# Altium PCB PCI Express Mini_3000X5095_52PIN_Full-Mini-Type F1.PCBDOC (part 1 of 8)
Units mm, origin at the board's own origin, x right, y up, seen from the top; angles counter-clockwise.
Board outline 70 x 83.2 mm, 6 copper layers (TopLayer, Layer 1, Layer 2, Layer 3, Layer 4, Bottom Layer), stack 0.914 mm thick; 380 components, 252 nets, 1258 pads, 603 vias.
Unrouted connection lines stored in the file: 10.
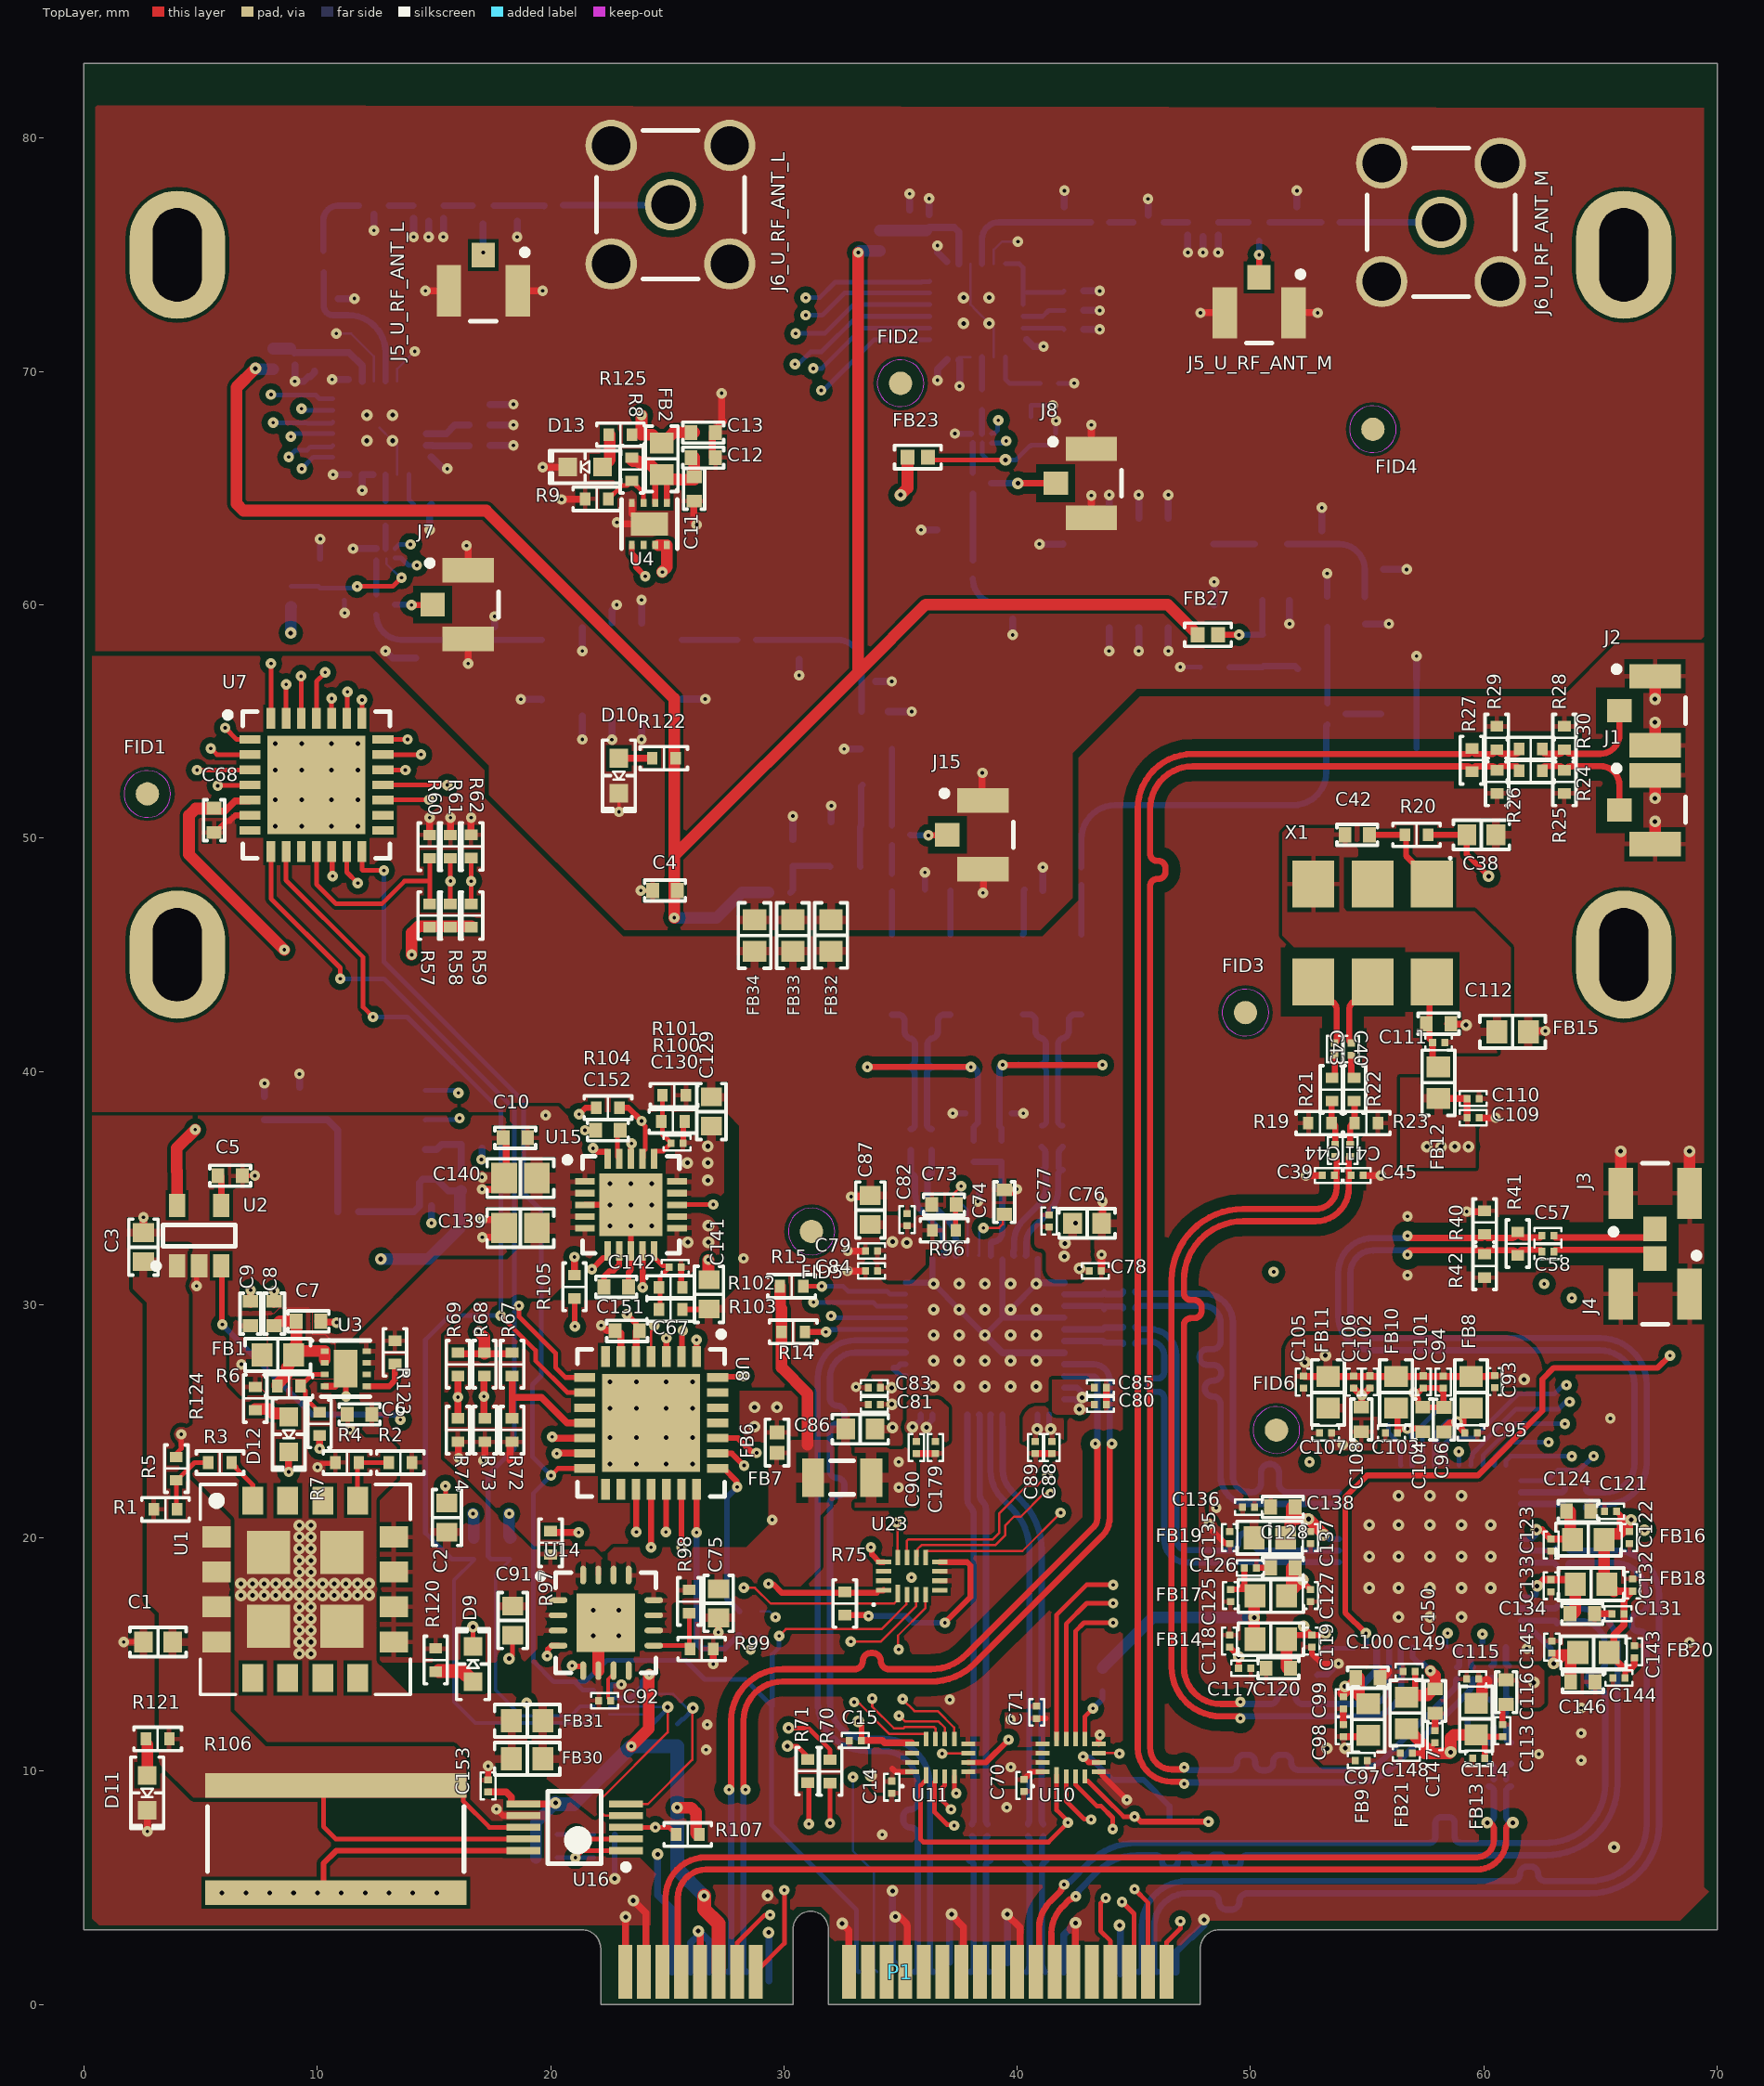
[diagram p0: TopLayer view]
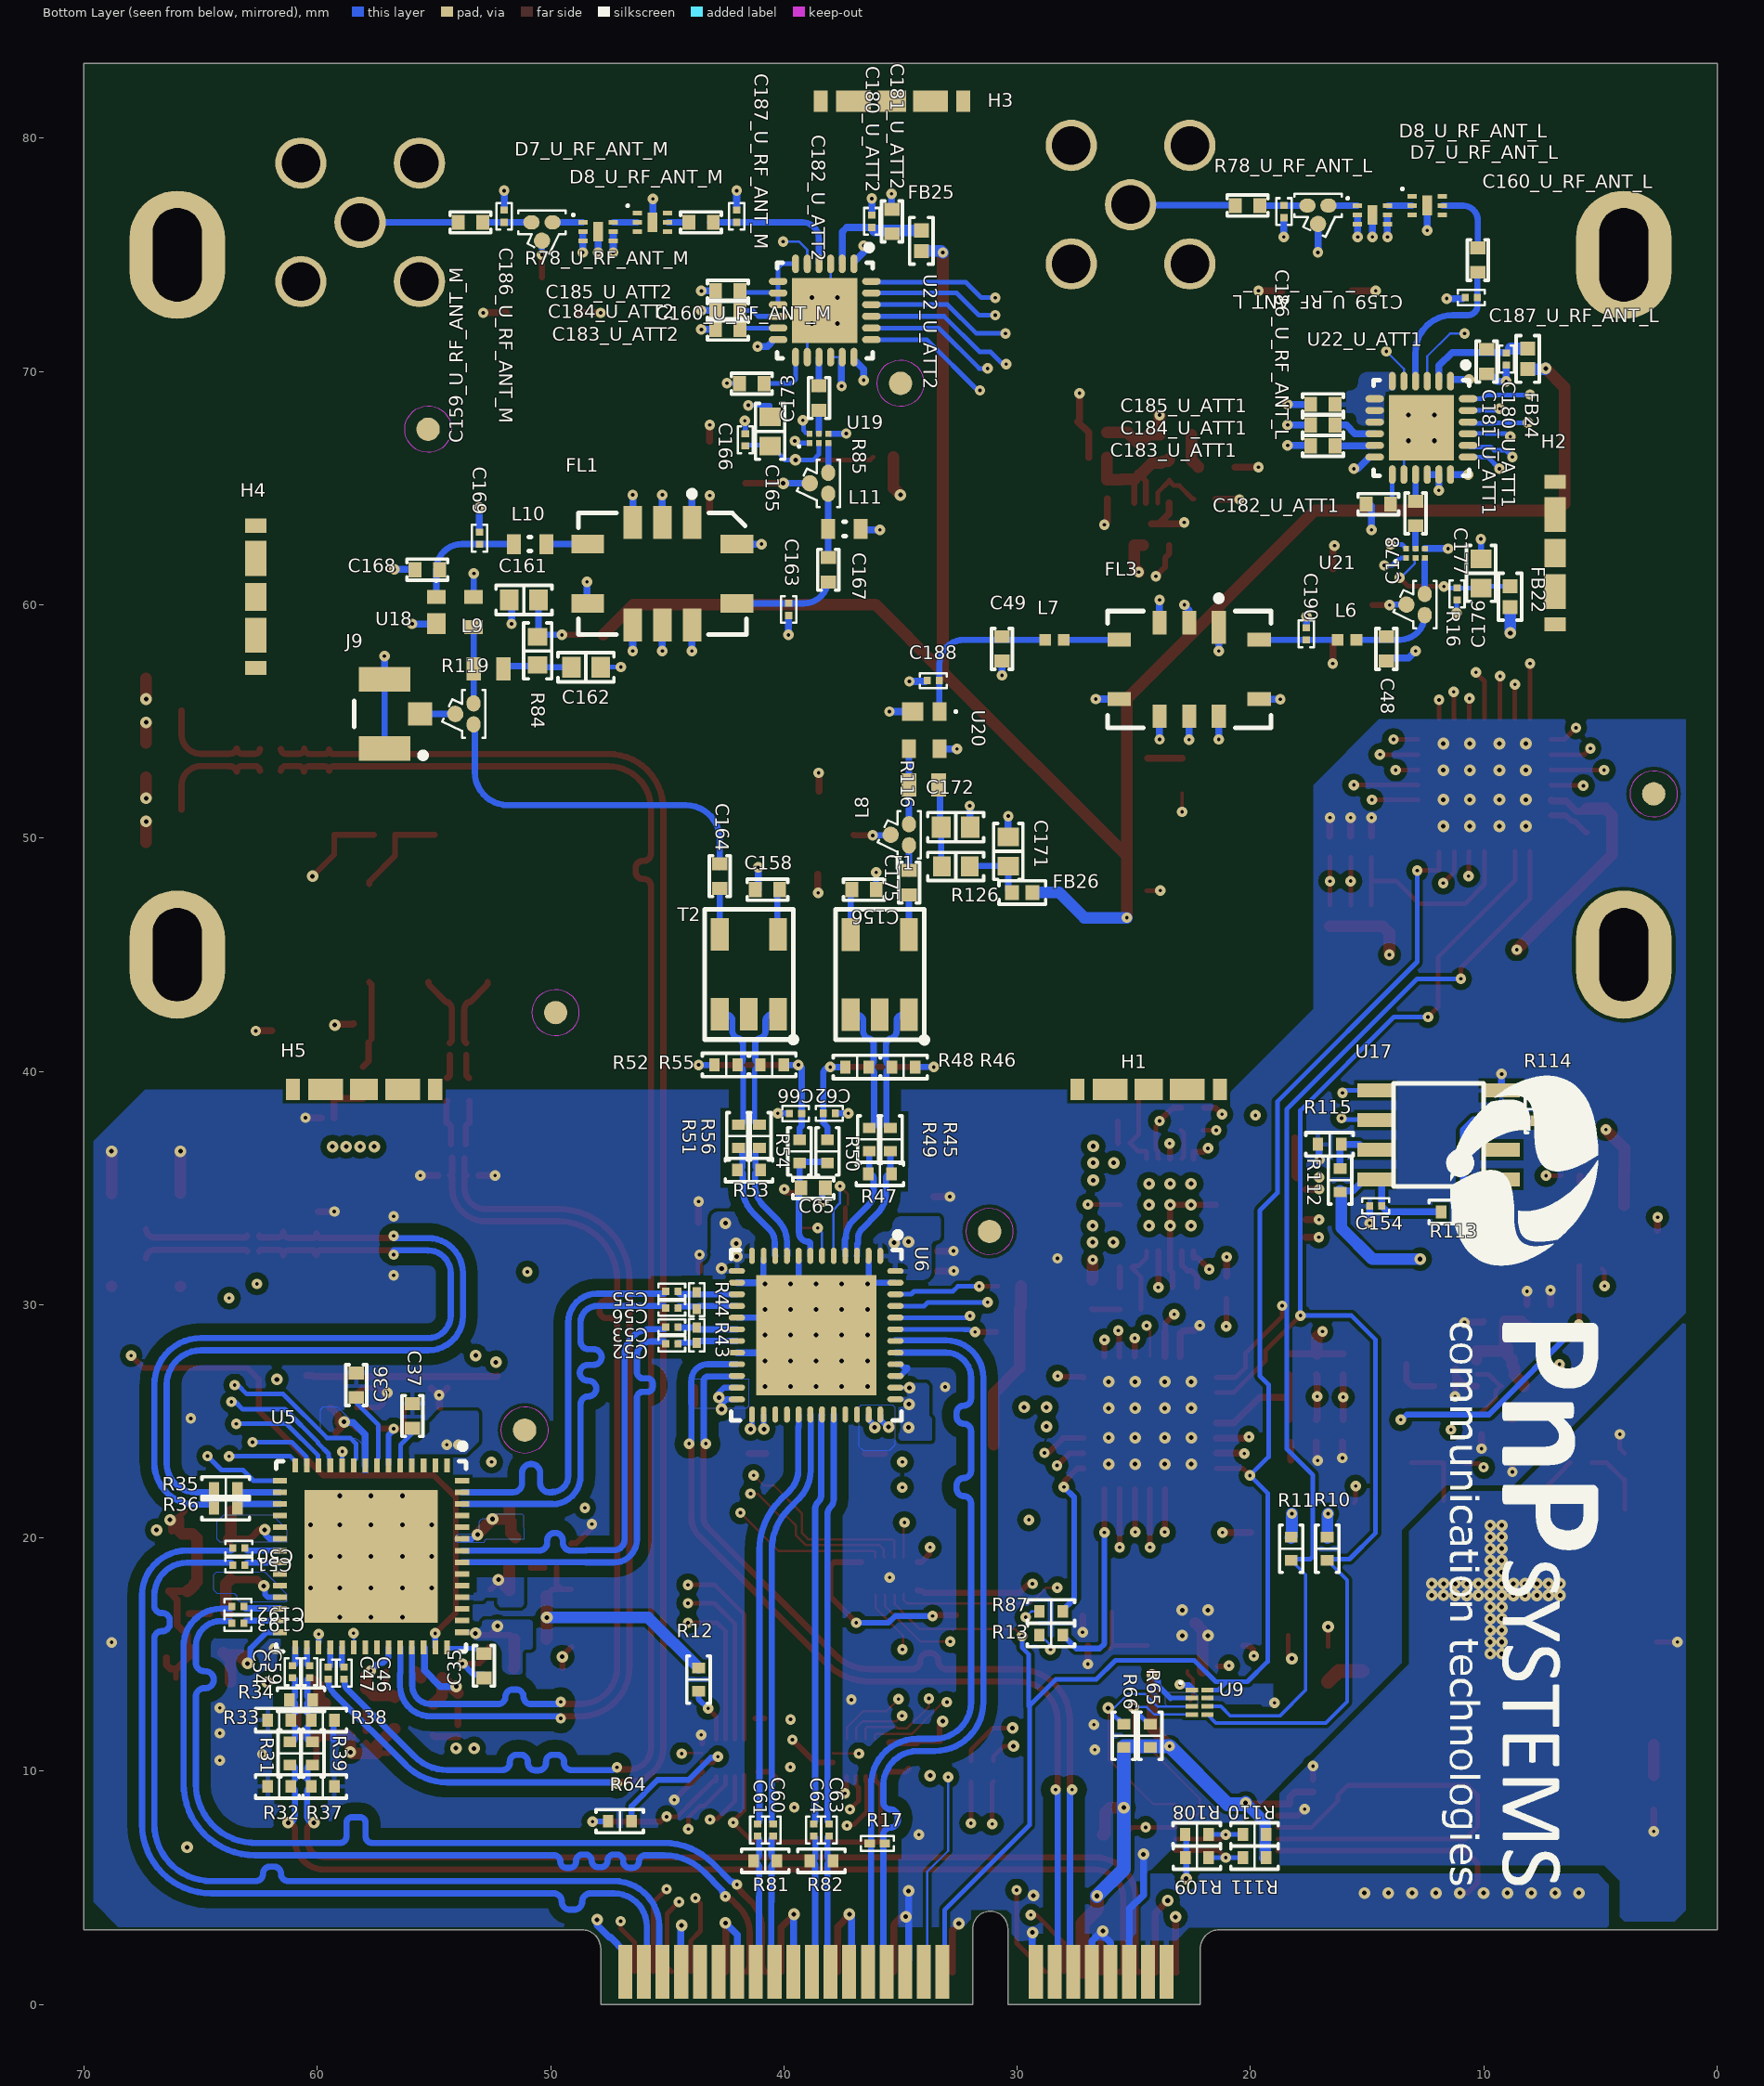
[diagram p1: Bottom Layer view, seen from below]
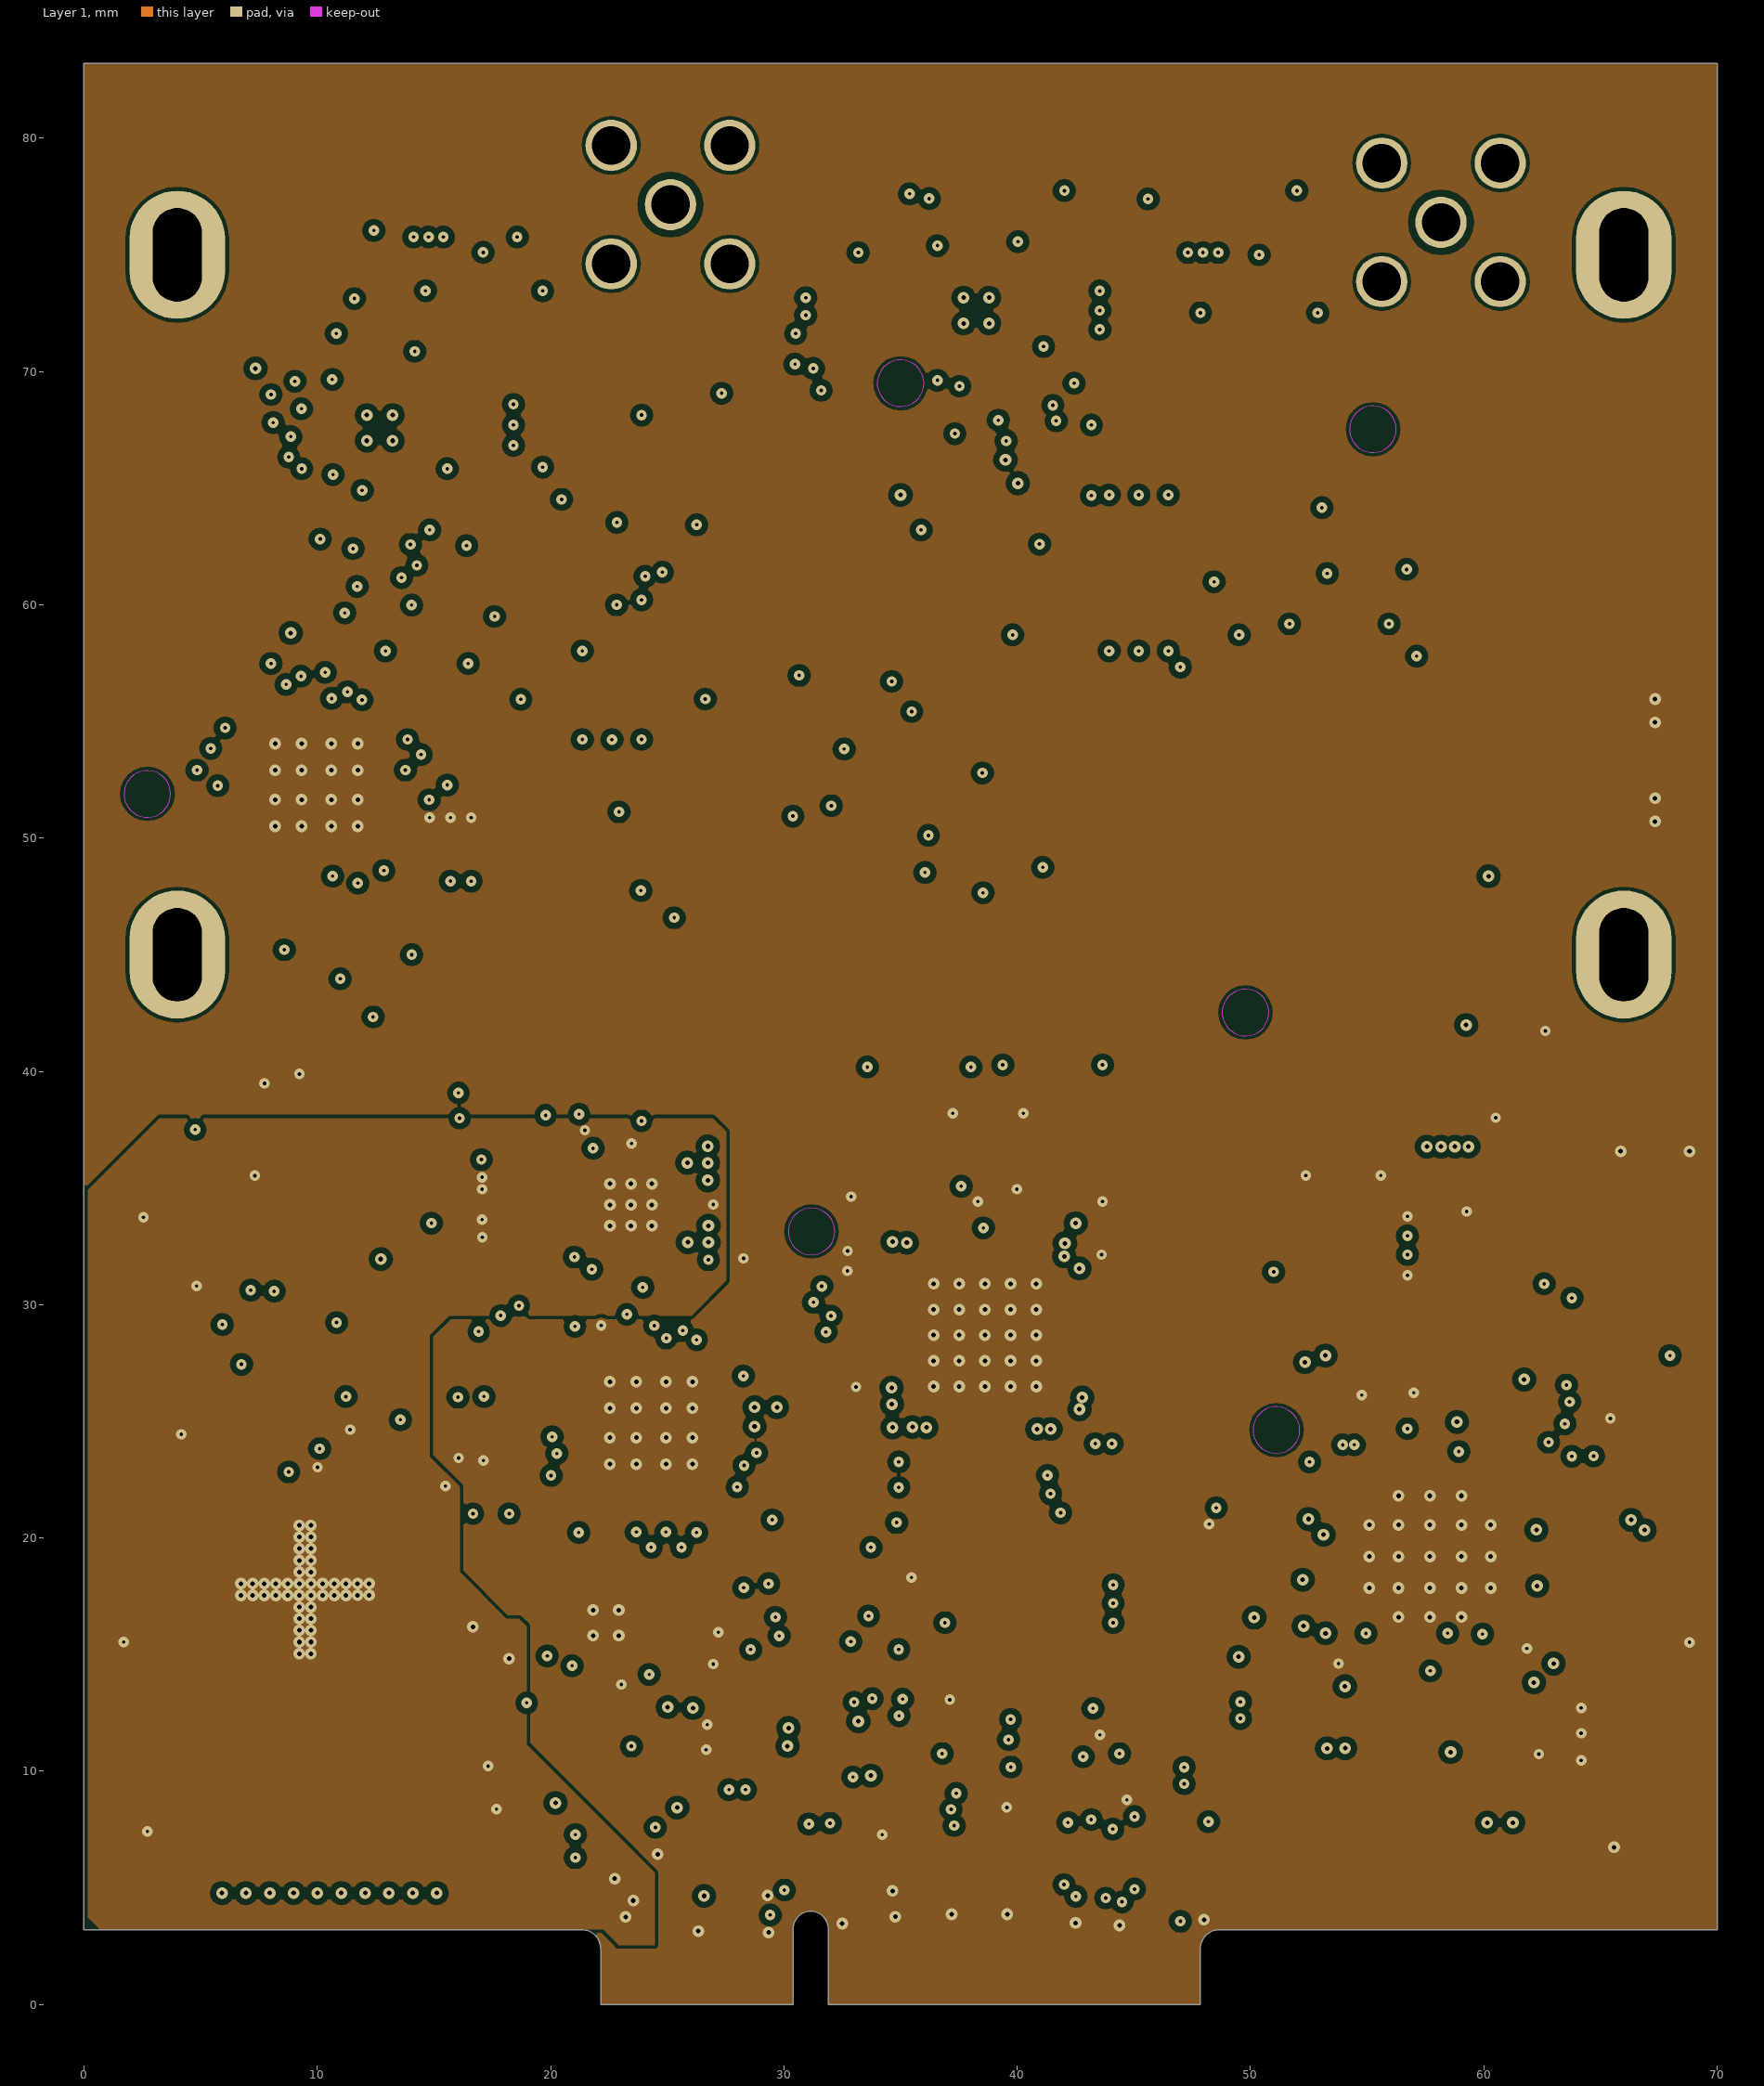
[diagram p2: Layer 1]
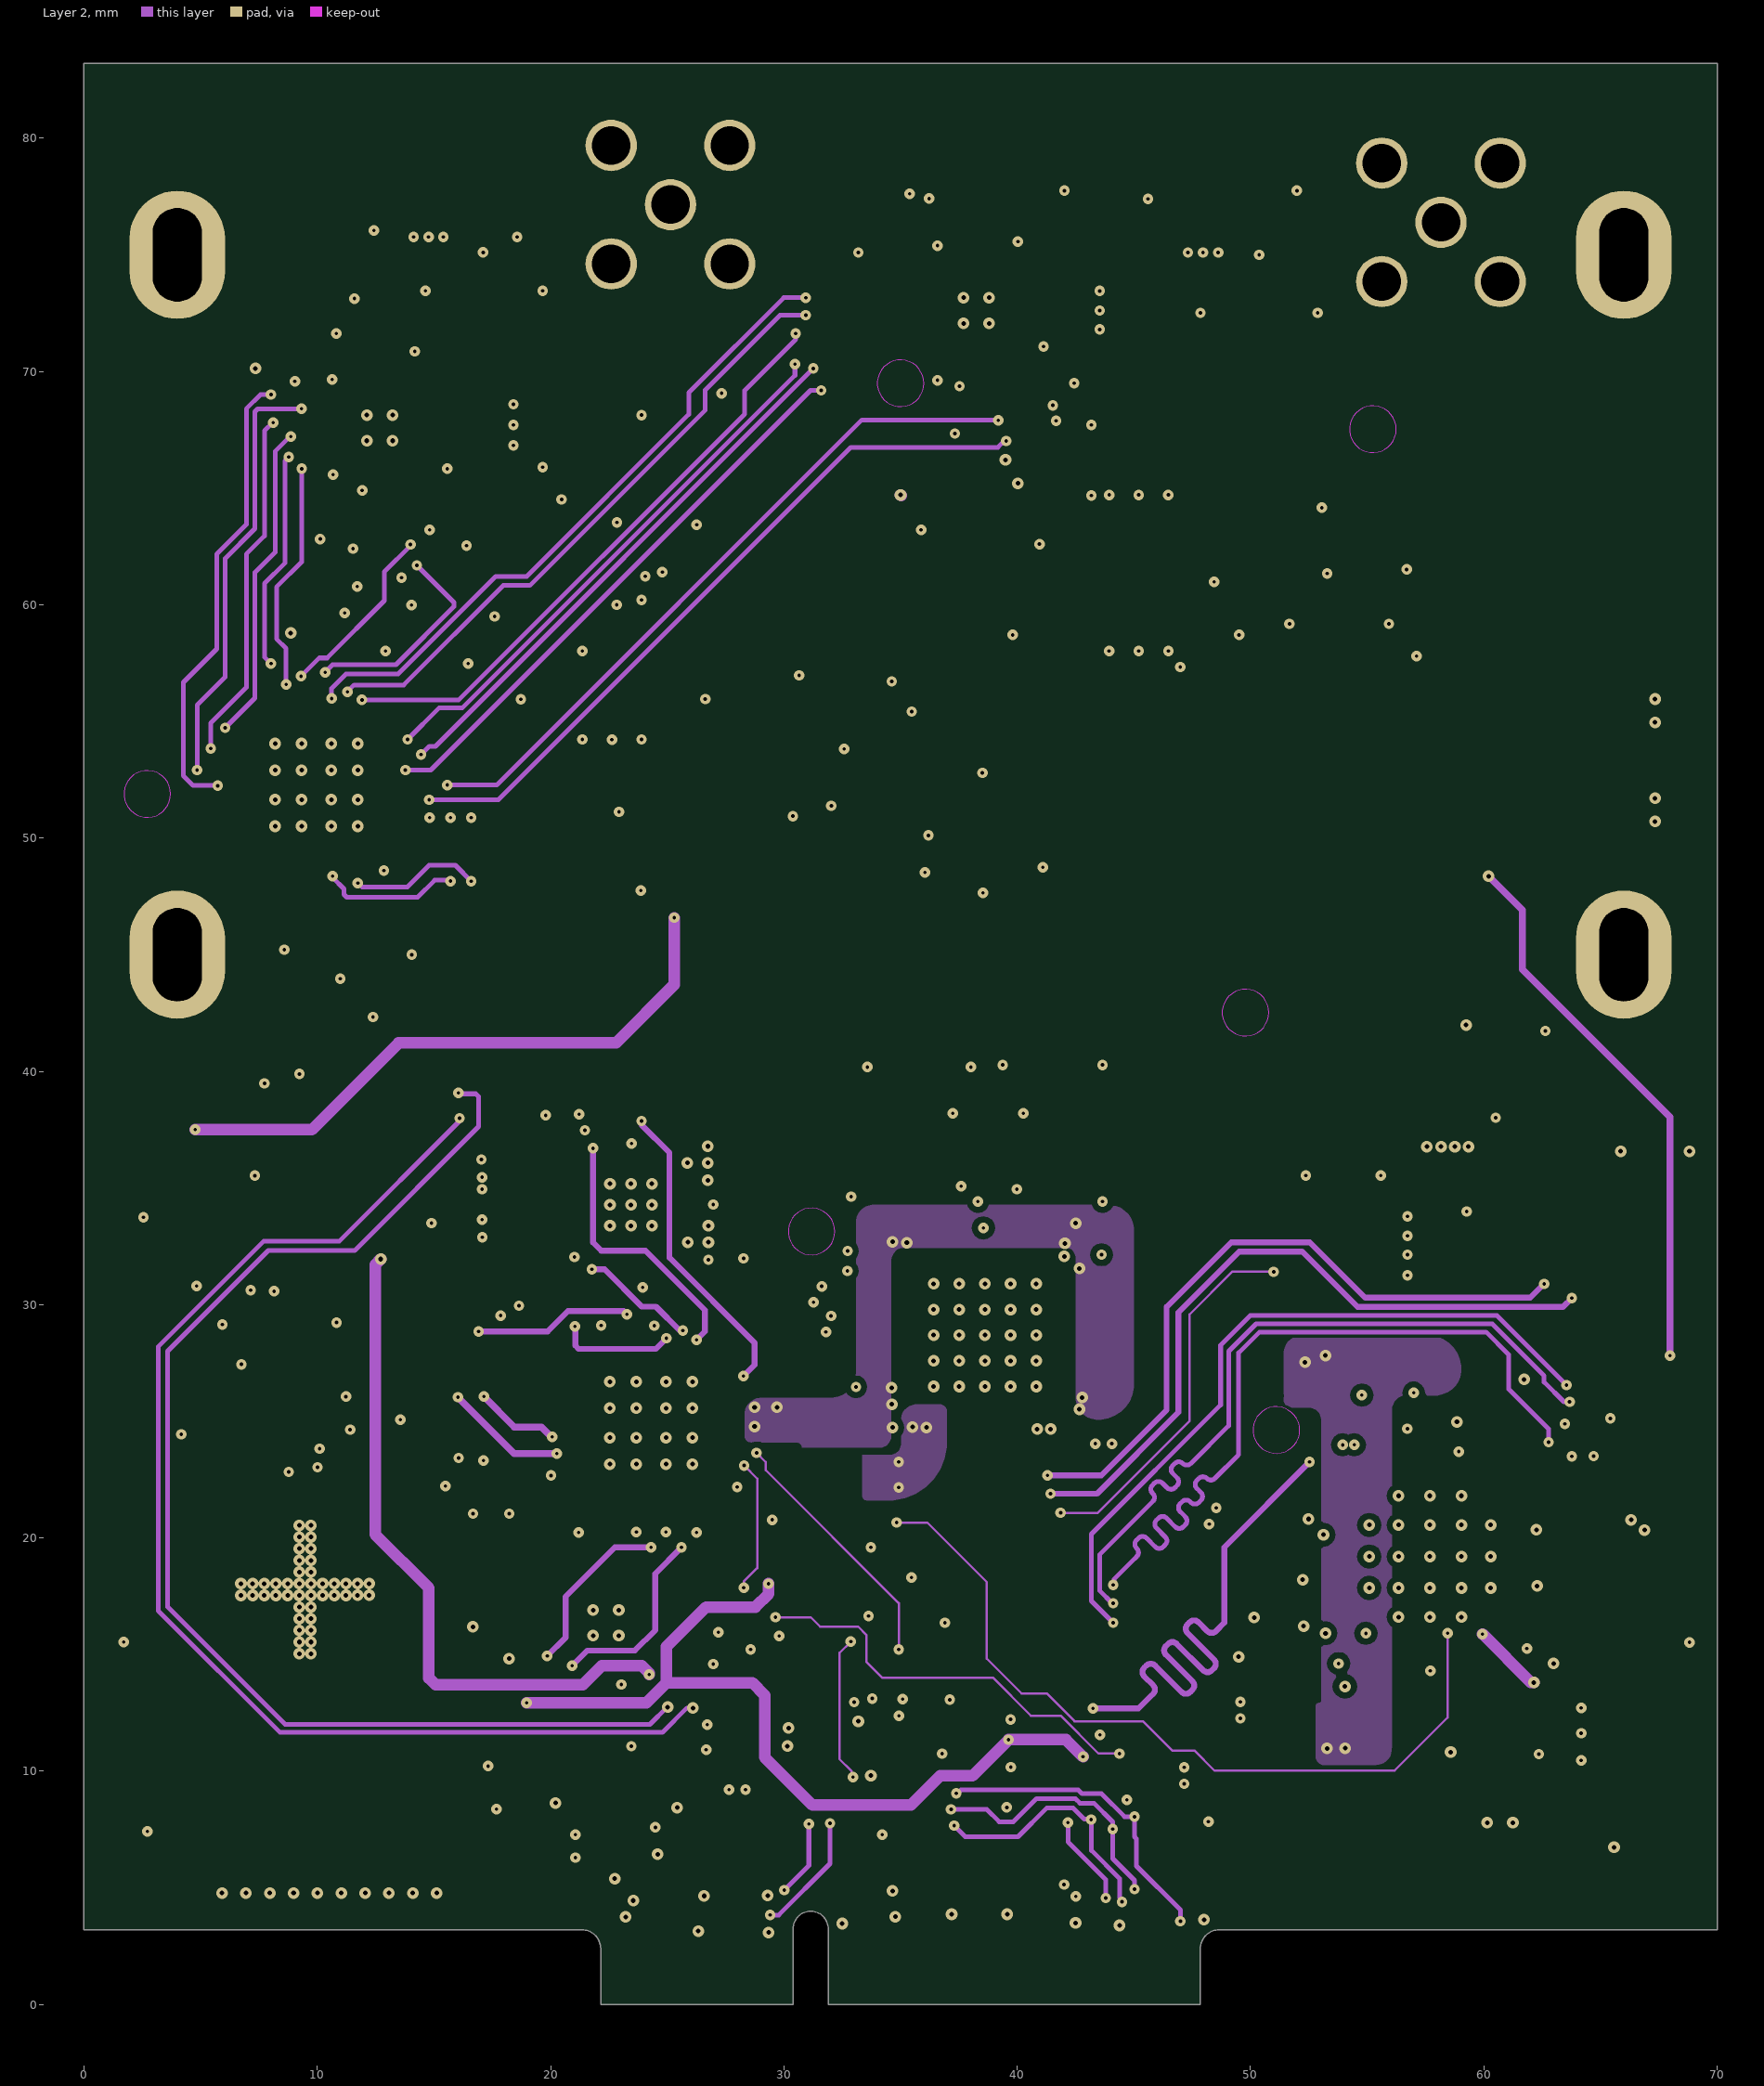
[diagram p3: Layer 2]
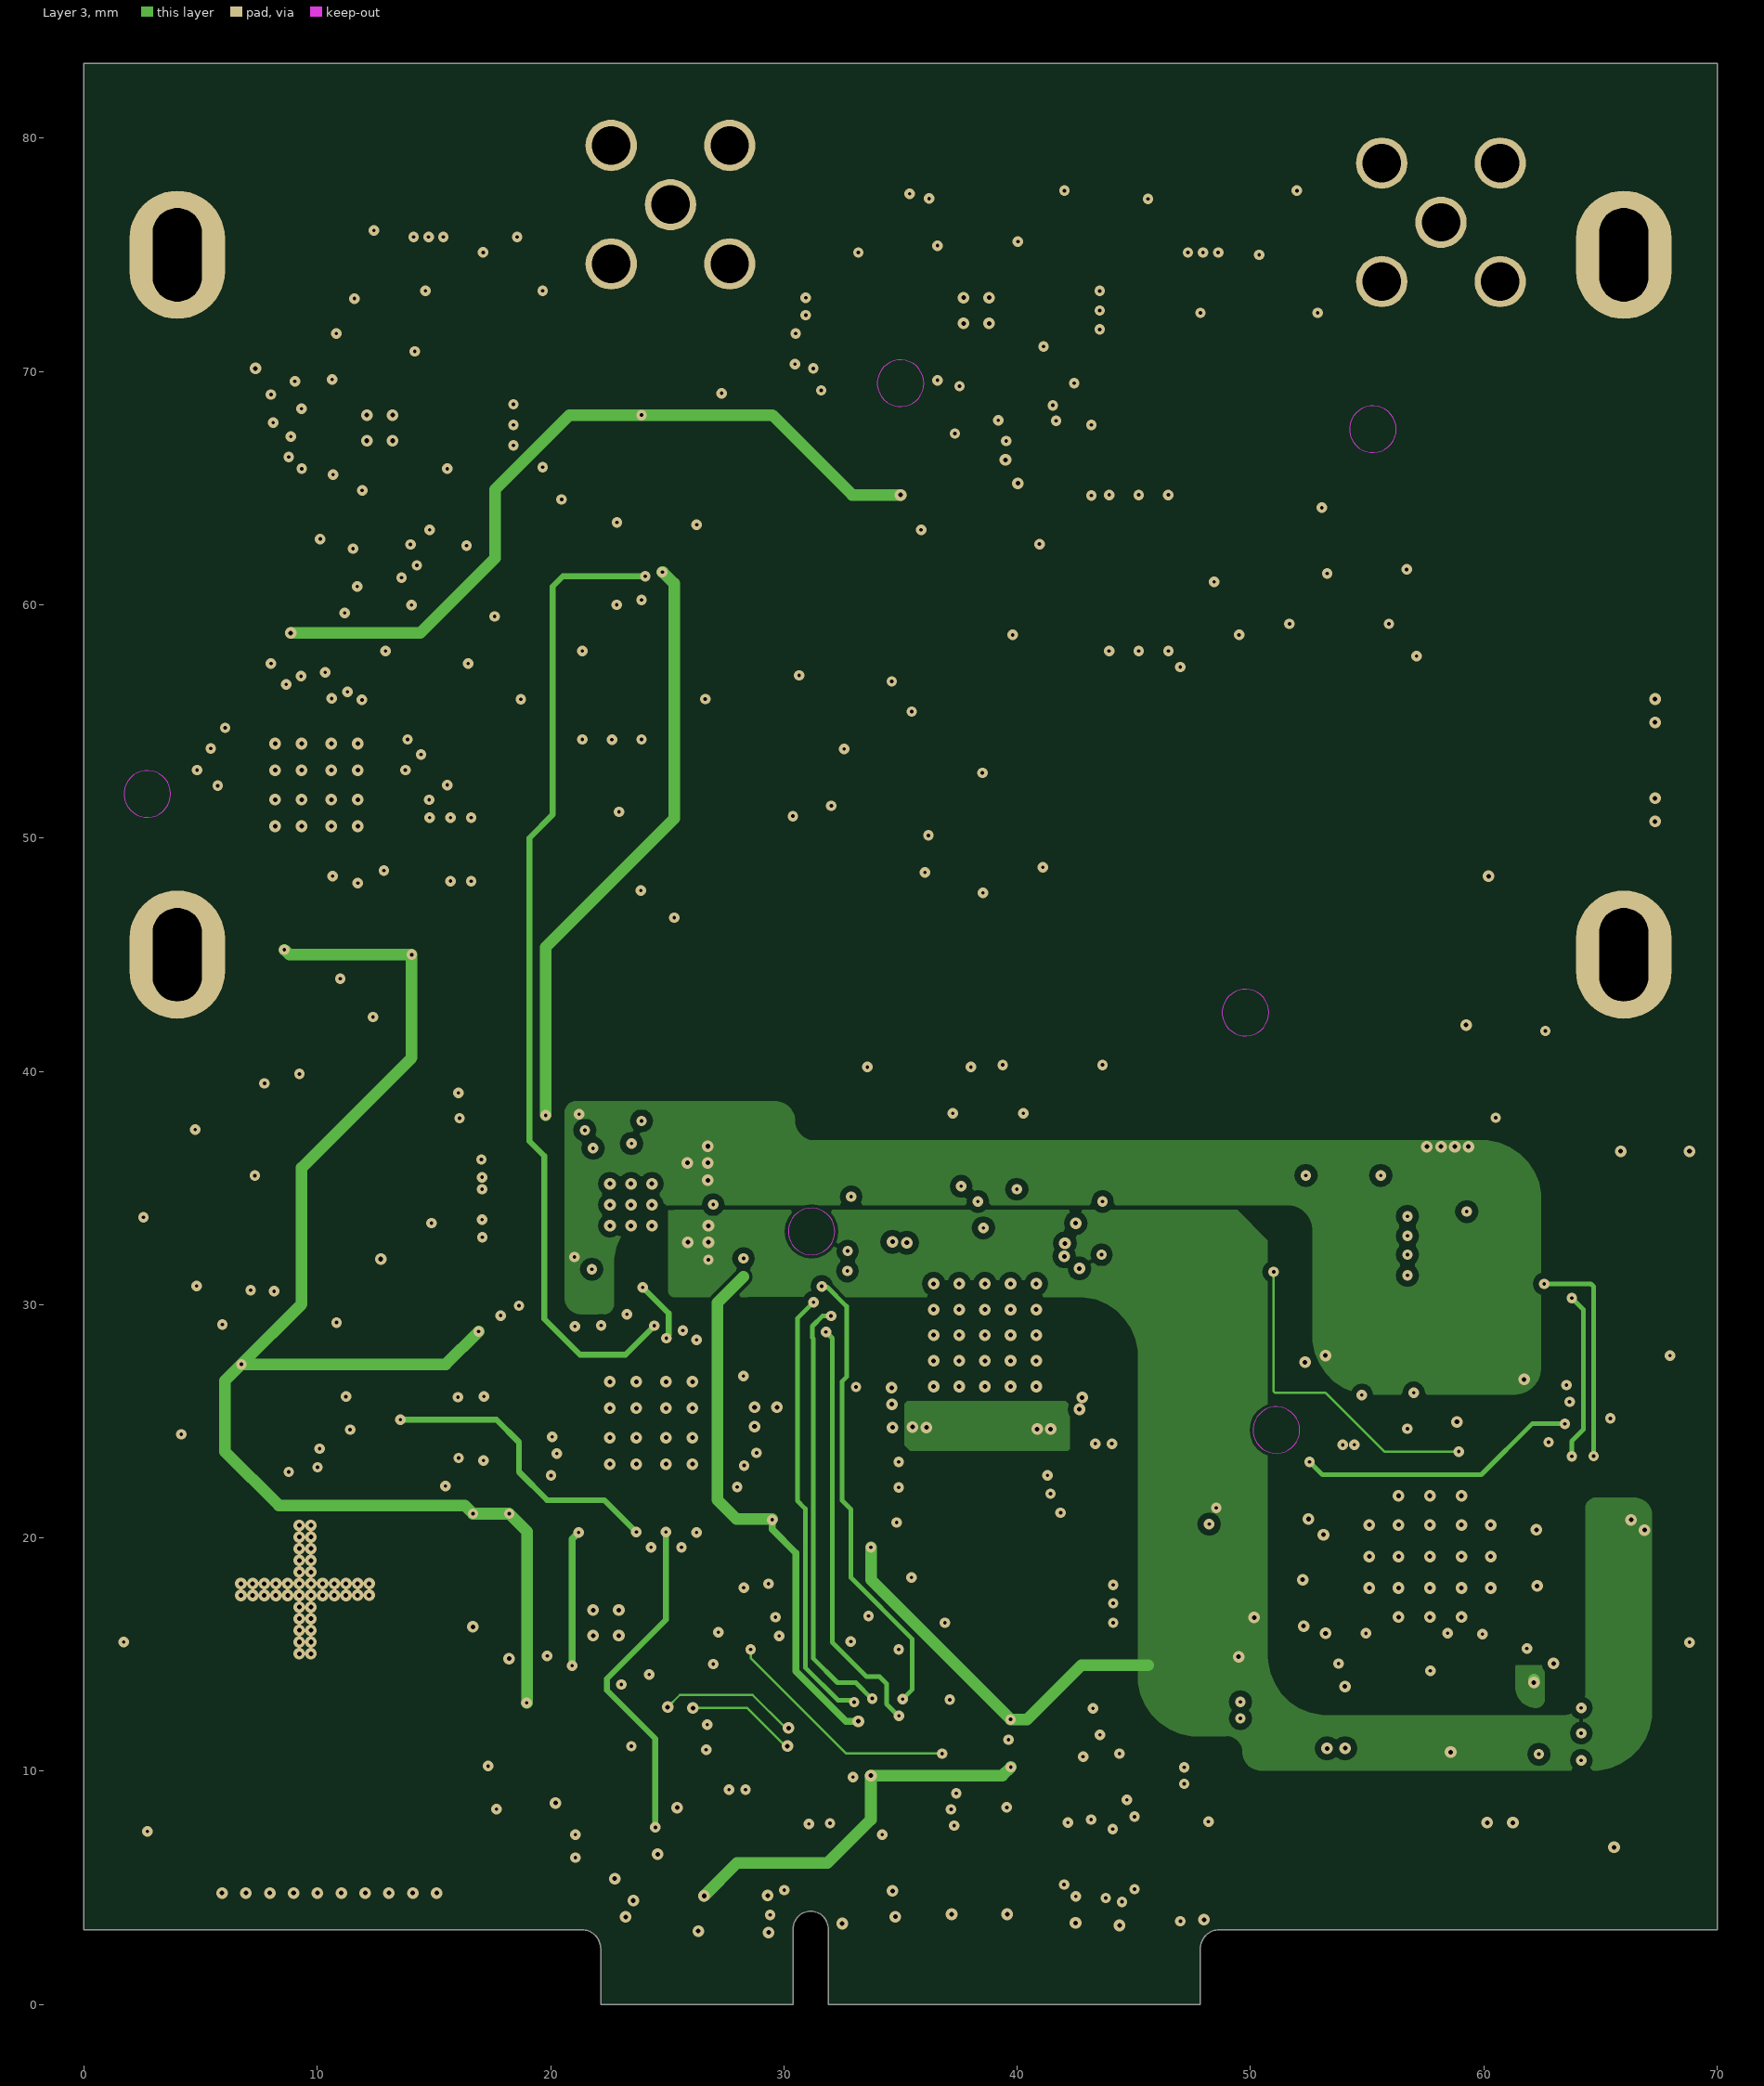
[diagram p4: Layer 3]
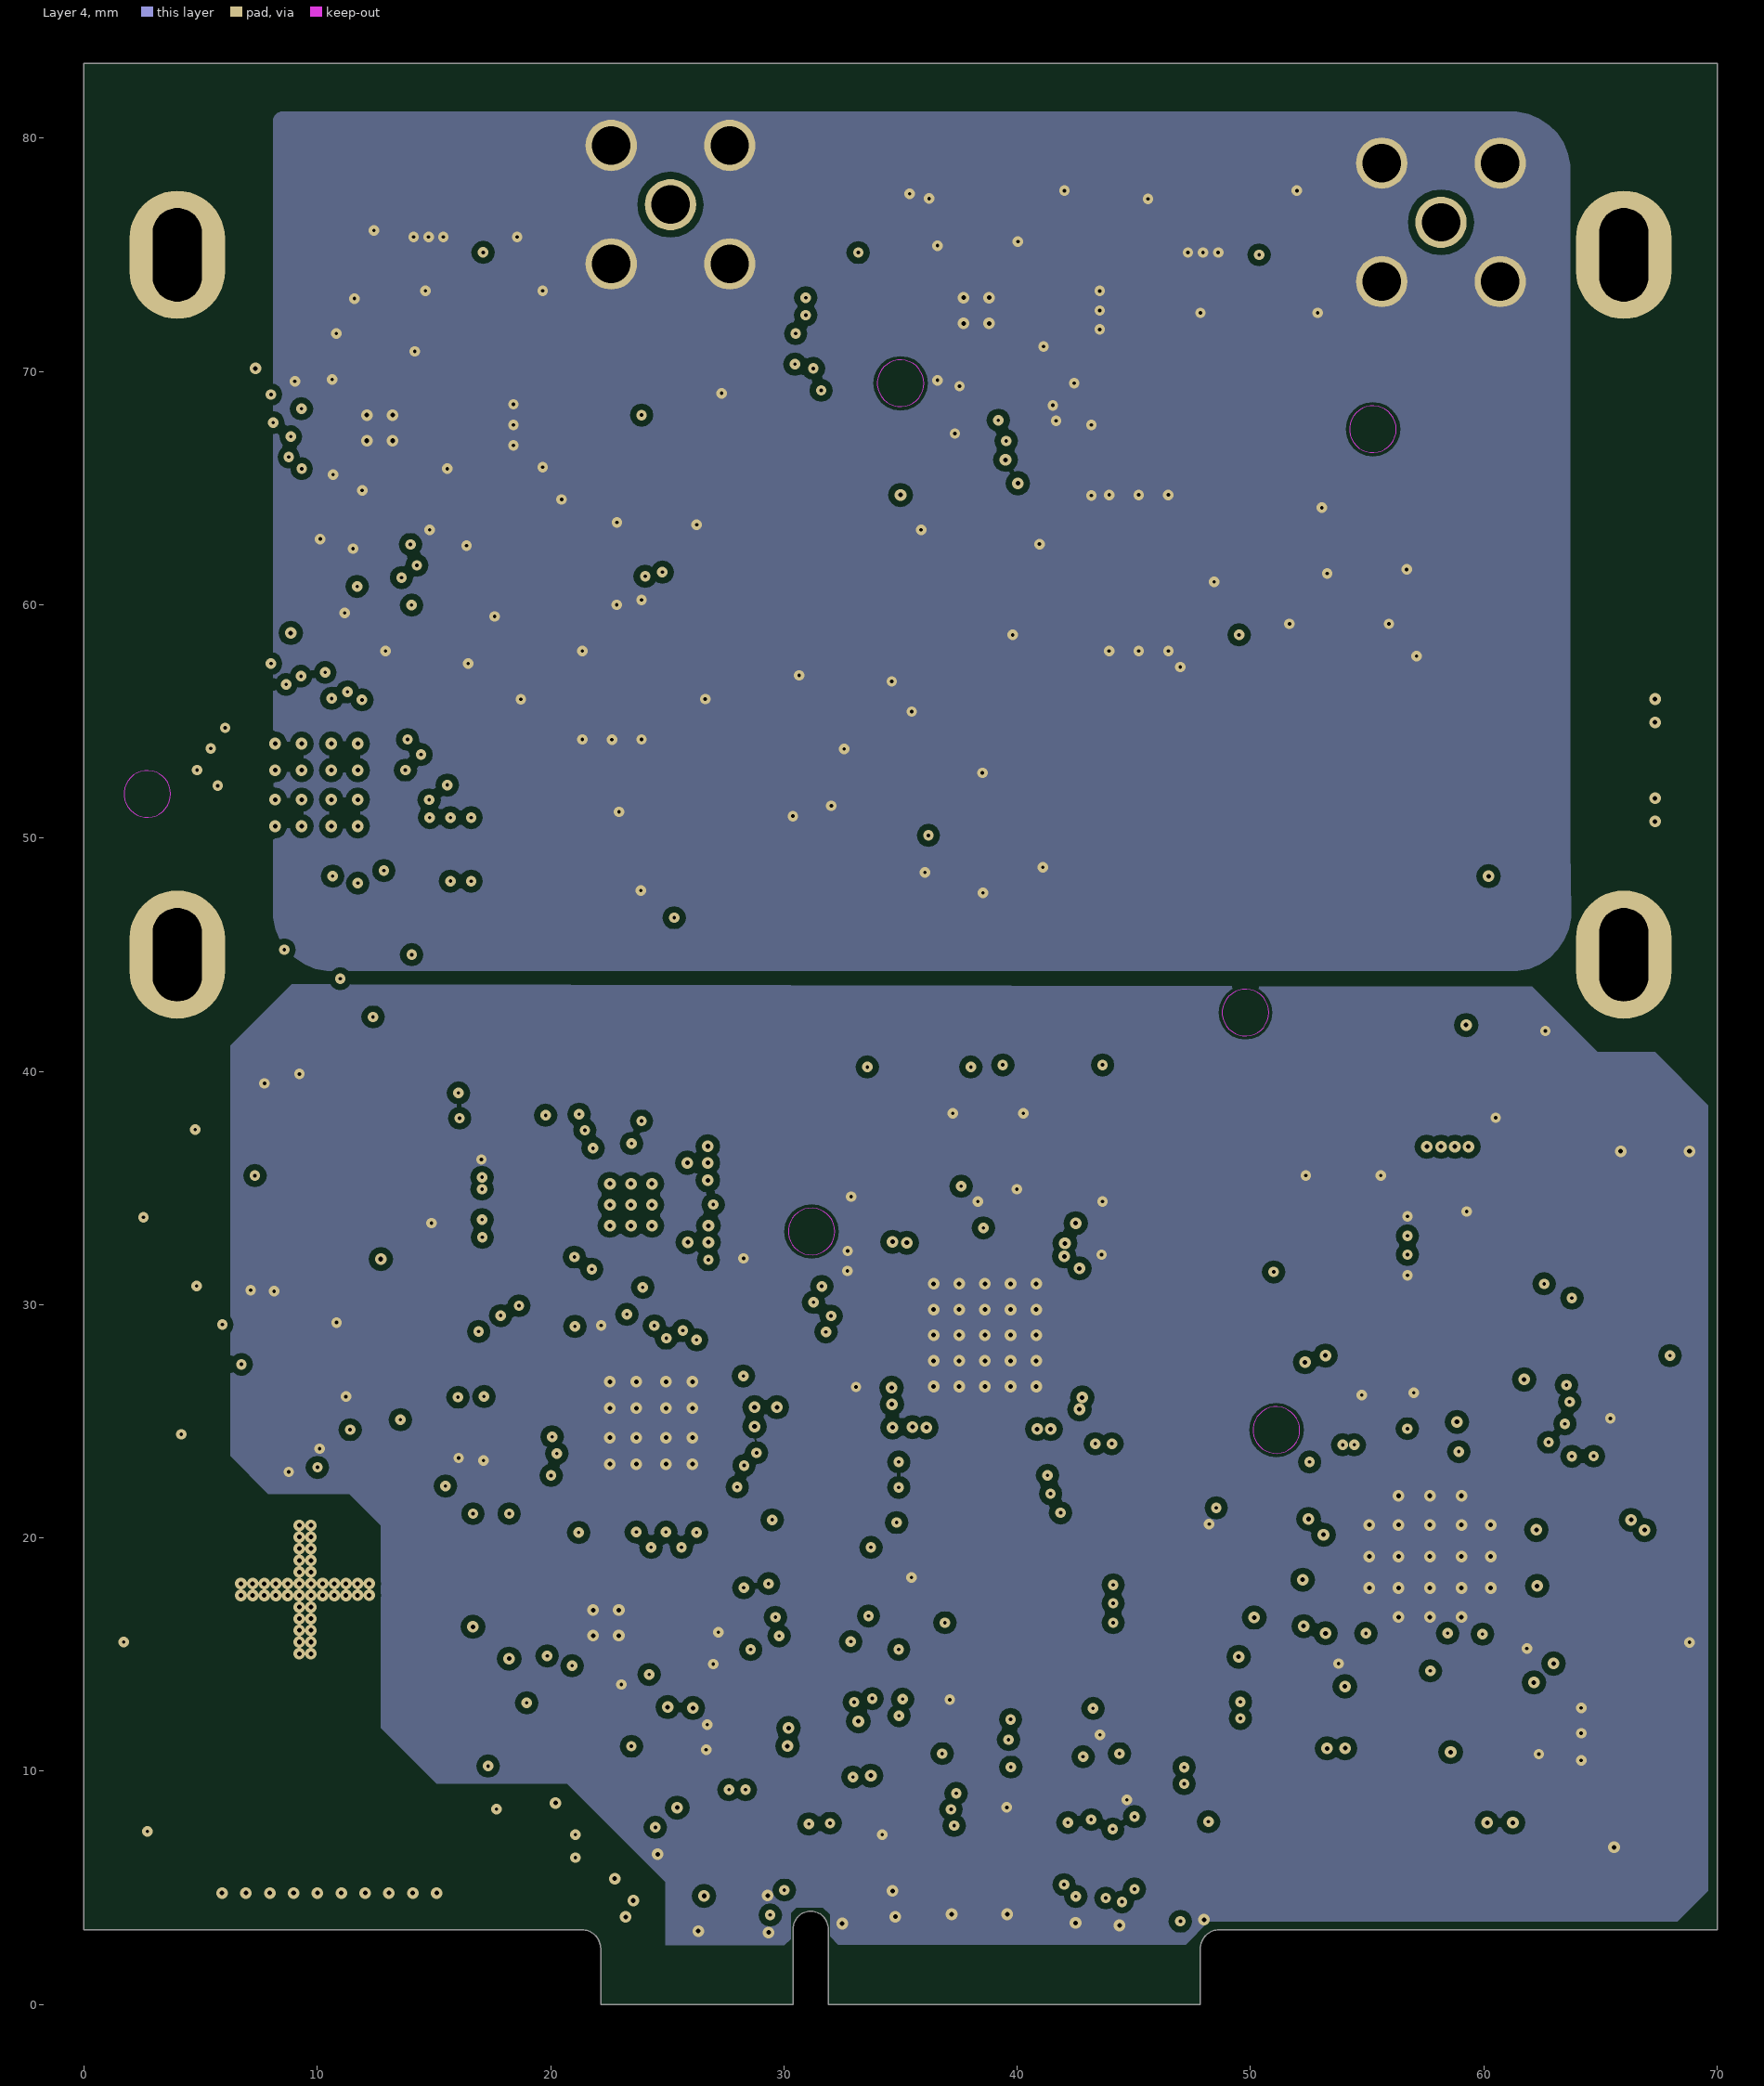
[diagram p5: Layer 4]

## Layer stack, top to bottom
TopSolder: solder mask 0.01, Solder Resist, Dk 3.5
TopLayer: signal copper 0.017
Dielectric1: prepreg 0.16, PP-008, Dk 4.29
Layer 1: signal copper 0.053
Dielectric 2: core 0.094, Core-009, Dk 3.96
Layer 2: signal copper 0.053
Dielectric2: prepreg 0.16, PP-016, Dk 4.29
Layer 3: signal copper 0.053
Dielectric 3: core 0.094, Core-009, Dk 3.96
Layer 4: signal copper 0.053
Dielectric 1: prepreg 0.16, PP-008, Dk 4.29
Bottom Layer: signal copper 0.017
Bottom Solder: solder mask 0.01, Solder Resist, Dk 3.5

## Board outline
22.15,2.4 ccw(c21.35,2.4) 21.35,3.2 0,3.2 0,83.2 70,83.2 70,3.2 48.65,3.2 ccw(c48.65,2.4) 47.85,2.4 47.85,0 31.9,0 31.9,3.25 ccw(c31.15,3.25) 30.4,3.25 30.4,0 22.15,0

## Design rules (kind name [scope] priority, off if disabled: settings)
Clearance Clearance_Via [IsVia] p1: gap=0.1 ignorepadtopadclearanceinfootprint=FALSE except(0.26: Arc-Via Track-Via Via-Via Via-Fill Via-Poly Via-Region; 0.5: Arc-Arc Arc-Track Track-Track)
Clearance Clearance_diff [InAnyDifferentialPair] p2: gap=0.5 ignorepadtopadclearanceinfootprint=TRUE except(0.2: Arc-Arc Arc-Track Arc-SMDPad Track-Track Track-SMDPad SMDPad-SMDPad; 0.26: Via-Via Via-Fill Via-Poly Via-Region)
Clearance Clearance_50 [InNetClass('Single50')] p3: gap=0.3 ignorepadtopadclearanceinfootprint=TRUE except(0.15: Arc-SMDPad Track-SMDPad; 0.25: Arc-Arc Arc-Track Track-Track)
Clearance "Clearance_Edge Connector" [(InComponentClass('Edge Connector')) vs (InComponentClass('Edge Connector'))] p4: gap=0.2 ignorepadtopadclearanceinfootprint=FALSE except(0: Arc-Hole Track-Hole SMDPad-Hole THPad-Hole Via-Hole Fill-Hole Poly-Hole Region-Hole Text-Hole)
Clearance [All] p5: gap=0.15 ignorepadtopadclearanceinfootprint=FALSE
DiffPairsRouting Diff_100 [InDifferentialPairClass('Diff_100')] p1: maxlimit=0.26 minlimit=0.23 mostfreqgap=0.254 toplayer_prefgap=0.26 toplayer_minwidth=0.267 toplayer_maxwidth=0.269 toplayer_prefwidth=0.268 bottomlayer_prefgap=0.26 bottomlayer_minwidth=0.267 bottomlayer_maxwidth=0.269 bottomlayer_prefwidth=0.268 impedanceprofiledriven=TRUE impedanceprofileid={4EC12C71-731A-4A04-9E39-5B54F8BA15AE} impedanceprofilevalue=100.000000 maxuncoupledlength=12.7
FabricationTestPointUsage TestPointUsage [All] p1: valid=0 allowmultiple=FALSE
FabricationTestpoint Testpoint [All] p1: side=3 testpointundercomponent=TRUE minsize=1.016 maxsize=2.54 preferedsize=1.524 minholesize=0.508 maxholesize=1.016 preferedholesize=0.813 testpointgrid=0.025 allowsidetop=TRUE allowsidebottom=TRUE usegrid=TRUE gridtolerance=0
Height "PCI Express Mini, \"Component height constraints\", Page 18, bottom side" [OnBottomLayer] p1: minheight=0 maxheight=1.35 prefheight=1.35
Height "PCI Express Mini, \"Component height constraints\", Page 18, top side" [OnTopLayer] p2: minheight=0 maxheight=2.4 prefheight=2.4
Length ADC_CLK_SYS_DISTR [InDifferentialPair('CLKout10') or InDifferentialPair('CLKout8')] p1: maxlimit=18.5 minlimit=17.5
Length FPGA_CLK [InNetClass('FPGA_CLK')] p2: maxlimit=42 minlimit=41
Length ADC_DATA_OUT_TO_FPGA [InNetClass('Data_OUT_TO FPGA')] p3: maxlimit=22.86 minlimit=22.352
Length ADC_DATA_OUT_TO_CAP_1 [InDifferentialPair('CMLOUT_AC') or InDifferentialPair('CMLOUT_BC')] p4: maxlimit=19.5 minlimit=19
MatchedLengths MatchedLengths_CLK [InDifferentialPair('LMK_OSC_IN') or InDifferentialPair('CLKout1_C') or InDifferentialPair('CLKin0P') or InDifferentialPair('CLKin1') or InDifferentialPair('0F')] p1: tolerance=1 checknetsindiffpair=TRUE checkdiffpairvsdiffpair=FALSE checkxsignals=FALSE checkothers=FALSE
MatchedLengths [InNetClass('FPGA_CLK')] p2: tolerance=1 checknetsindiffpair=TRUE checkdiffpairvsdiffpair=FALSE checkxsignals=FALSE checkothers=FALSE
MatchedLengths DiffPair_ADC_TO_FPGA [InNetClass('Data_OUT_TO FPGA')] p3: tolerance=0.381 checknetsindiffpair=TRUE checkdiffpairvsdiffpair=FALSE checkxsignals=FALSE checkothers=FALSE
MatchedLengths DiffPair_ADC [InNetClass('Data_OUT_TO_CAP')] p4: tolerance=0.5 checknetsindiffpair=TRUE checkdiffpairvsdiffpair=FALSE checkxsignals=FALSE checkothers=FALSE
PlaneClearance [All] p1: clearance=0.5
PlaneConnect [All] p1: planeconnectstyle=Direct reliefexpansion=0.508 reliefentries=4 reliefconductorwidth=0.254 reliefairgap=0.254
PolygonConnect "Connect Res0201" [HasFootprint('RES 0201/0603')] p1: thpad.connectstyle=Direct thpad.reliefconductorwidth=0.254 thpad.reliefentries=4 thpad.polygonreliefangle="90 Angle" thpad.airgapwidth=0.254 smdpad.connectstyle=Relief smdpad.reliefconductorwidth=0.2 smdpad.reliefentries=4 smdpad.polygonreliefangle="90 Angle" smdpad.airgapwidth=0.2 via.connectstyle=Direct via.reliefconductorwidth=0.254 via.reliefentries=4 via.polygonreliefangle="90 Angle" via.airgapwidth=0.254
PolygonConnect "Connect CAP0201" [HasFootprint('CAP 0201/0603 KK')] p2: thpad.connectstyle=Direct thpad.reliefconductorwidth=0.254 thpad.reliefentries=4 thpad.polygonreliefangle="90 Angle" thpad.airgapwidth=0.254 smdpad.connectstyle=Relief smdpad.reliefconductorwidth=0.2 smdpad.reliefentries=4 smdpad.polygonreliefangle="90 Angle" smdpad.airgapwidth=0.2 via.connectstyle=Direct via.reliefconductorwidth=0.254 via.reliefentries=4 via.polygonreliefangle="90 Angle" via.airgapwidth=0.254
PolygonConnect "Connect CAP0402" [HasFootprint('CAP 0402/1005 RF KK')] p3: thpad.connectstyle=Direct thpad.reliefconductorwidth=0.254 thpad.reliefentries=4 thpad.polygonreliefangle="90 Angle" thpad.airgapwidth=0.254 smdpad.connectstyle=Relief smdpad.reliefconductorwidth=0.2 smdpad.reliefentries=4 smdpad.polygonreliefangle="90 Angle" smdpad.airgapwidth=0.2 via.connectstyle=Direct via.reliefconductorwidth=0.254 via.reliefentries=4 via.polygonreliefangle="90 Angle" via.airgapwidth=0.254
PolygonConnect "Connect CAP080" [HasFootprint('CAP 0805/2012 RF')] p4: thpad.connectstyle=Direct thpad.reliefconductorwidth=0.254 thpad.reliefentries=4 thpad.polygonreliefangle="90 Angle" thpad.airgapwidth=0.254 smdpad.connectstyle=Relief smdpad.reliefconductorwidth=0.5 smdpad.reliefentries=4 smdpad.polygonreliefangle="90 Angle" smdpad.airgapwidth=0.25 via.connectstyle=Direct via.reliefconductorwidth=0.254 via.reliefentries=4 via.polygonreliefangle="90 Angle" via.airgapwidth=0.254
PolygonConnect "Connect CAP0603" [HasFootprint('CAP 0603/1608 RF')] p5: thpad.connectstyle=Direct thpad.reliefconductorwidth=0.254 thpad.reliefentries=4 thpad.polygonreliefangle="90 Angle" thpad.airgapwidth=0.254 smdpad.connectstyle=Relief smdpad.reliefconductorwidth=0.35 smdpad.reliefentries=4 smdpad.polygonreliefangle="90 Angle" smdpad.airgapwidth=0.25 via.connectstyle=Direct via.reliefconductorwidth=0.254 via.reliefentries=4 via.polygonreliefangle="90 Angle" via.airgapwidth=0.254
PolygonConnect "Connect FB0603_1" [HasFootprint('FER 0603/1608 KK') or HasFootprint('FB0603')] p6: thpad.connectstyle=Direct thpad.reliefconductorwidth=0.254 thpad.reliefentries=4 thpad.polygonreliefangle="90 Angle" thpad.airgapwidth=0.254 smdpad.connectstyle=Relief smdpad.reliefconductorwidth=0.35 smdpad.reliefentries=4 smdpad.polygonreliefangle="90 Angle" smdpad.airgapwidth=0.25 via.connectstyle=Direct via.reliefconductorwidth=0.254 via.reliefentries=4 via.polygonreliefangle="90 Angle" via.airgapwidth=0.254
PolygonConnect "Connect FB0603" [HasFootprint('FB1206')] p7: thpad.connectstyle=Direct thpad.reliefconductorwidth=0.254 thpad.reliefentries=4 thpad.polygonreliefangle="90 Angle" thpad.airgapwidth=0.254 smdpad.connectstyle=Relief smdpad.reliefconductorwidth=0.45 smdpad.reliefentries=4 smdpad.polygonreliefangle="90 Angle" smdpad.airgapwidth=0.25 via.connectstyle=Direct via.reliefconductorwidth=0.254 via.reliefentries=4 via.polygonreliefangle="90 Angle" via.airgapwidth=0.254
PolygonConnect "Connect Res0402" [HasFootprint('RES 0402/1005 RF KK')] p8: thpad.connectstyle=Direct thpad.reliefconductorwidth=0.254 thpad.reliefentries=4 thpad.polygonreliefangle="90 Angle" thpad.airgapwidth=0.254 smdpad.connectstyle=Relief smdpad.reliefconductorwidth=0.2 smdpad.reliefentries=4 smdpad.polygonreliefangle="90 Angle" smdpad.airgapwidth=0.2 via.connectstyle=Direct via.reliefconductorwidth=0.254 via.reliefentries=4 via.polygonreliefangle="90 Angle" via.airgapwidth=0.254
PolygonConnect "Connect Res06031" [HasFootprint('RES 0603/1608 RF')] p9: thpad.connectstyle=Direct thpad.reliefconductorwidth=0.254 thpad.reliefentries=4 thpad.polygonreliefangle="90 Angle" thpad.airgapwidth=0.254 smdpad.connectstyle=Relief smdpad.reliefconductorwidth=0.35 smdpad.reliefentries=4 smdpad.polygonreliefangle="90 Angle" smdpad.airgapwidth=0.25 via.connectstyle=Direct via.reliefconductorwidth=0.254 via.reliefentries=4 via.polygonreliefangle="90 Angle" via.airgapwidth=0.254
PolygonConnect Power_Line1 [InNetClass('Power_Line')] p10: thpad.connectstyle=Direct thpad.reliefconductorwidth=0.254 thpad.reliefentries=4 thpad.polygonreliefangle="90 Angle" thpad.airgapwidth=0.254 smdpad.connectstyle=Relief smdpad.reliefconductorwidth=0.2 smdpad.reliefentries=4 smdpad.polygonreliefangle="90 Angle" smdpad.airgapwidth=0.2 via.connectstyle=Direct via.reliefconductorwidth=0.254 via.reliefentries=4 via.polygonreliefangle="90 Angle" via.airgapwidth=0.254
PolygonConnect [All] p11: connectstyle=Direct reliefconductorwidth=0.254 reliefentries=4 polygonreliefangle="90 Angle" airgapwidth=0.254
RoomDefinition "Component keep out area bottom" [Not (InComponentClass('Edge Connector'))] p1: confinementstyle=ConfineOut formatcopy=TRUE lockcomponents=FALSE outline 20,5.1 50,5.1 50,3.138 48.65,3.138 48.321,3.064 48.092,2.915 47.915,2.666 47.85,2.354 47.85,0 22.15,0 22.15,2.354 22.083,2.69 21.956,2.89 21.626,3.089 21.35,3.138 20,3.138
RoomDefinition "Component keep out area top" [Not (InComponentClass('Edge Connector'))] p2: confinementstyle=ConfineOut formatcopy=TRUE lockcomponents=FALSE outline 21.35,3.2 21.4,3.25 30.2,3.25 30.2,4.2 32.1,4.2 32.1,3.25 32.15,3.2 48.45,3.2 ccw(c48.45,2.888) 48.229,3.109 48.016,2.896 ccw(c48.417,2.494) 47.85,2.494 47.85,0 22.15,0 22.15,2.513 ccw(c21.574,2.513) 21.981,2.921 21.814,3.088 ccw(c21.727,3.002) 21.727,3.124 ccw(c21.544,2.941) 21.544,3.2
RoutingVias [All] p1: holewidth=0.711 width=1.27 viastyle="Through Hole" minholewidth=0.711 minwidth=1.27 maxholewidth=0.711 maxwidth=1.27 useviatemplates=TRUE viatemplateguid#1={88A6695F-8F1E-42C2-A705-81D2FC1924CC} viatemplateguid#2={6ECDD988-7257-49CB-BBFD-D7356C8FDD68} viatemplateguid#3={D78C474D-25A9-4C18-91EC-A7773D2B8F49} viatemplateguid#4={1CAF9723-81FE-4BE4-A96A-7240D60226CE} viatemplateguid#5={33274EF6-680B-47BB-B88C-FDD960DC3FC5} viatemplatename#1=v35h10m0mx0 viatemplatename#2=v45h15 viatemplatename#3=v45h15m0mx0 viatemplatename#4=v40h20 viatemplatename#5=v50h20m0mx0
SilkToSolderMaskClearance SilkscreenOverComponentPads [IsPad] p1: minsilkscreentomaskgap=0.254 clearancetoexposedcopper=TRUE
SolderMaskExpansion [HasPad('J2-M2')] p1: expansion=0 istentingtop=FALSE
ViasUnderSMD [All] p1: allowed=FALSE
Width Width_S_50 [InNetClass('Single50')] p1: maxlimit=0.279 minlimit=0.254 preferedwidth=0.254 toplayer_minwidth=0.268 toplayer_maxwidth=0.269 toplayer_prefwidth=0.268 bottomlayer_minwidth=0.268 bottomlayer_maxwidth=0.269 bottomlayer_prefwidth=0.268 impedanceprofiledriven=TRUE impedanceprofileid={40FFE645-052D-4050-9BA8-CD5BD897BE0C} impedanceprofilevalue=50.000000 minimp=50.000000 maximp=50.000000 favimp=50.000000
Width Width_POWER [InNetClass('Power_Line')] p2: maxlimit=1 minlimit=0.25 preferedwidth=0.5
Width Width_simple [All] p3: maxlimit=0.3 minlimit=0.1 preferedwidth=0.25
23 further rules are at their usual default settings.

## Classes and differential pairs
component class Karta_ILS_TETRA: FID1 FID2 FID3 FID4 FID5 FID6 H1 H2 H3 H4 H5
net class 0F: 0F_N 0F_P
net class FPGA_CLK: CLKout3_C_N CLKout3_C_P CLKout5_C_N CLKout5_C_P
net class "Data_OUT_TO FPGA": CMLOUT_A_N CMLOUT_A_P CMLOUT_B_N CMLOUT_B_P
net class Data_OUT_TO_CAP: CMLOUT_AC_N CMLOUT_AC_P CMLOUT_BC_N CMLOUT_BC_P
differential pair class Diff_100: 0F Ain_2122_A AIn_2122_B Ain_2122A AIn_2122B CLKin0 CLKin0P CLKin1 CLKin1P CLKout1 CLKout1_C CLKout1_C2 CLKout2 CLKout2_C CLKout3 CLKout3_C CLKout4 CLKout4_C CLKout5 CLKout5_C CLKout5_C2 CLKout8 CLKout8_C CLKout9 CLKout9_C CLKout10 CLKout10_C CMLOUT_A CMLOUT_AC CMLOUT_B CMLOUT_BC LMK_CLKin0 LMK_CLKin1 LMK_OSC_IN PET1 PET2 PET3 SYNC VCXO_OUT
channel class RF_ANT: U_RF_ANT_L U_RF_ANT_M
channel class ATT: U_ATT1 U_ATT2
net class SYNC: SYNC_N SYNC_P
net class Single50: Ain_2122_A_N AIn_2122_A_P AIn_2122_B_N AIn_2122_B_P Ain_2122A_N AIn_2122A_P AIn_2122B_N AIn_2122B_P CLKin0_N CLKin0_P CLKin0P_N CLKin0P_P CLKin1P_N CLKin1P_P LMK_CLKin0_N LMK_CLKin0_P LMK_CLKin1_N LMK_CLKin1_P LMK_OSC_IN_N LMK_OSC_IN_P NetC40_1 NetC41_2 NetC43_1 NetC44_2 NetC48_2 NetC49_2 NetC62_2 NetC65_2 NetC66_2 NetC111_2 NetC158_2 NetC159_U_RF_ANT_L_1 NetC159_U_RF_ANT_L_2 NetC159_U_RF_ANT_M_1 NetC159_U_RF_ANT_M_2 NetC160_U_RF_ANT_L_1 NetC160_U_RF_ANT_L_2 NetC160_U_RF_ANT_M_1 NetC160_U_RF_ANT_M_2 NetC162_1 NetC163_2 NetC164_1 NetC164_2 NetC167_1 NetC168_2 NetC172_1 NetC173_1 NetC173_2 NetC175_2 NetC178_1 NetC178_2 NetC190_2 NetD7_U_RF_ANT_L_1 NetD7_U_RF_ANT_L_6 NetD7_U_RF_ANT_M_1 NetD7_U_RF_ANT_M_6 NetFL1_D NetFL3_4 NetJ7_2 NetJ8_2 NetJ9_2 NetJ15_2 NetL8_1 NetL9_1 NetR16_2 NetR85_2 TorRF_50Ohm_20 TorRF_50Ohm_21 Vcc_5V_AMP_1 Vcc_5V_AMP_2 VCXO_OUT_N VCXO_OUT_P
net class Power_Line: 2V8_RF 3V3_DIGIT 3V3_MB 3V6_DCDC 5V 2122_0VDD 2122_VCC 4610_FINE_V +12 CTRL_VCXO GND GND_VCXO NetC7_2 NetC11_2 NetC42_2 NetC111_2 NetD9_1 NetD10_1 NetD11_1 NetD12_1 NetD13_1 SPI_1V8_ADC SPI_1V8_CLK Vcc_5V_ATT_1 Vcc_5V_ATT_2 VDD_CORE VDD_IO VDD_OSC VDD_PLL1 VDD_PLL2CORE VDD_PLL2OSC VDDO_1/2 VDDO_3/4 VDDO_5 VDDO_6 VDDO_7/8 VDDO_9/10
net class LMK_PWR_Line: GND VDD_CORE VDD_IO VDD_OSC VDD_PLL1 VDD_PLL2CORE VDD_PLL2OSC VDDO_1/2 VDDO_3/4 VDDO_5 VDDO_6 VDDO_7/8 VDDO_9/10
net class Diff_100: Ain_2122_A_N AIn_2122_A_P AIn_2122_B_N AIn_2122_B_P Ain_2122A_N AIn_2122A_P AIn_2122B_N AIn_2122B_P CLKin0_N CLKin0_P CLKin1_N CLKin1_P CLKout1_C2_N CLKout1_C2_P CLKout1_C_N CLKout1_C_P CLKout1_N CLKout1_P CLKout3_C_N CLKout3_C_P CLKout3_N CLKout3_P CLKout5_C_N CLKout5_C_P CLKout5_N CLKout5_P CLKout8_C_N CLKout8_C_P CLKout8_N CLKout8_P CLKout10_C_N CLKout10_C_P CLKout10_N CLKout10_P LMK_CLKin0_N LMK_CLKin0_P LMK_CLKin1_N LMK_CLKin1_P NetC111_2 SYNC_N SYNC_P VCXO_OUT_N VCXO_OUT_P
net class CLK_TO_CAP: CLKout1_N CLKout1_P CLKout3_N CLKout3_P CLKout5_N CLKout5_P CLKout8_N CLKout8_P CLKout10_N CLKout10_P
net class CLK_In2: LMK_CLKin0_N LMK_CLKin0_P LMK_CLKin1_N LMK_CLKin1_P
net class CLK_In1: CLKin0_N CLKin0_P CLKin1_N CLKin1_P
net class CLK_DIST_OUT: CLKout1_N CLKout1_P CLKout3_N CLKout3_P CLKout5_N CLKout5_P CLKout8_N CLKout8_P CLKout10_N CLKout10_P
net class Ain: Ain_2122_A_N AIn_2122_A_P AIn_2122_B_N AIn_2122_B_P
net class ADC_CLK: CLKout8_N CLKout8_P CLKout10_N CLKout10_P
component class U_Tor_330MHz: C161 C162 C163 C165 C166 C167 C168 C169 C173 FL1 J8 J9 L9 L10 L11 R84 R85 R119 U18 U19
component class "U_TOR ILS": C48 C49 C171 C172 C176 C177 C178 C188 C190 FL3 J7 J15 L6 L7 L8 R16 R116 R126 U20 U21
component class U_RF_LANES: C156 C158 C164 C175 FB22 FB23 FB24 FB25 FB26 FB27 T1 T2
component class U_RF_ANT_M: C159_U_RF_ANT_M C160_U_RF_ANT_M C186_U_RF_ANT_M C187_U_RF_ANT_M D7_U_RF_ANT_M D8_U_RF_ANT_M J5_U_RF_ANT_M J6_U_RF_ANT_M R78_U_RF_ANT_M
component class U_RF_ANT_L: C159_U_RF_ANT_L C160_U_RF_ANT_L C186_U_RF_ANT_L C187_U_RF_ANT_L D7_U_RF_ANT_L D8_U_RF_ANT_L J5_U_RF_ANT_L J6_U_RF_ANT_L R78_U_RF_ANT_L
component class U_POWER_CLK: C93 C94 C95 C96 C97 C98 C99 C100 C101 C102 C103 C104 C105 C106 C107 C108 C109 C110 C111 C112 C113 C114 C115 C116 C117 C118 C119 C120 C121 C122 C123 C124 C125 C126 C127 C128 C129 C130 C131 C132 C133 C134 C135 C136 C137 C138 C139 C140 C141 C142 C143 C144 C145 C146 C147 C148 C149 C150 C151 C152 FB8 FB9 FB10 FB11 FB12 FB13 FB14 FB15 FB16 FB17 FB18 FB19 FB20 FB21 R100 R101 R102 R103 R104 R105 U5 U15
component class U_POWER_ADC: C73 C74 C75 C76 C77 C78 C79 C80 C81 C82 C83 C84 C85 C86 C87 C88 C89 C90 C91 C92 C179 FB6 FB7 R96 R97 R98 R99 U6 U14
component class U_Komunikacja: C14 C15 C67 C68 C70 C71 R10 R11 R12 R13 R14 R15 R57 R58 R59 R60 R61 R62 R64 R65 R66 R67 R68 R69 R70 R71 R72 R73 R74 R75 R87 U7 U8 U9 U10 U11 U23
component class U_Flash_memory: C154 R112 R113 R114 R115 U17
component class U_Current_volatge_meas: C153 R106 R107 R108 R109 R110 R111 U16
component class U_CLOC_DISTR: C35 C36 C37 C38 C39 C40 C41 C42 C43 C44 C45 C46 C47 C50 C51 C52 C53 C54 C55 C56 C57 C58 C59 C192 C193 J1 J2 J3 J4 R19 R20 R21 R22 R23 R24 R25 R26 R27 R28 R29 R30 R31 R32 R33 R34 R35 R36 R37 R38 R39 R40 R41 R42 X1
component class U_ATT2: C180_U_ATT2 C181_U_ATT2 C182_U_ATT2 C183_U_ATT2 C184_U_ATT2 C185_U_ATT2 U22_U_ATT2
component class U_ATT1: C180_U_ATT1 C181_U_ATT1 C182_U_ATT1 C183_U_ATT1 C184_U_ATT1 C185_U_ATT1 U22_U_ATT1
component class U_ADC_LTC2122: C60 C61 C62 C63 C64 C65 C66 R43 R44 R45 R46 R47 R48 R49 R50 R51 R52 R53 R54 R55 R56 R81 R82
component class POWER_DISTRIBUTIONS: C1 C2 C3 C4 C5 C6 C7 C8 C9 C10 C11 C12 C13 D9 D10 D11 D12 D13 FB1 FB2 FB30 FB31 FB32 FB33 FB34 R1 R2 R3 R4 R5 R6 R7 R8 R9 R120 R121 R122 R123 R124 R125 U1 U2 U3 U4
component class "U_Connector miniPCIe": P1 R17
differential pair SYNC: +SYNC_P -SYNC_N
differential pair CLKout5: +CLKout5_P -CLKout5_N
differential pair CLKout5_C: +CLKout5_C_P -CLKout5_C_N
differential pair 0F: +0F_P -0F_N
differential pair VCXO_OUT: +VCXO_OUT_P -VCXO_OUT_N
differential pair LMK_OSC_IN: +LMK_OSC_IN_P -LMK_OSC_IN_N
differential pair CLKout1_C2: +CLKout1_C2_P -CLKout1_C2_N
differential pair CLKout8: +CLKout8_P -CLKout8_N
differential pair CLKout8_C: +CLKout8_C_P -CLKout8_C_N
differential pair CLKout3: +CLKout3_P -CLKout3_N
differential pair CLKout3_C: +CLKout3_C_P -CLKout3_C_N
differential pair CLKout10: +CLKout10_P -CLKout10_N
differential pair CLKout10_C: +CLKout10_C_P -CLKout10_C_N
differential pair LMK_CLKin1: +LMK_CLKin1_P -LMK_CLKin1_N
differential pair LMK_CLKin0: +LMK_CLKin0_P -LMK_CLKin0_N
differential pair CMLOUT_B: +CMLOUT_B_P -CMLOUT_B_N
differential pair CMLOUT_BC: +CMLOUT_BC_P -CMLOUT_BC_N
differential pair CMLOUT_A: +CMLOUT_A_P -CMLOUT_A_N
differential pair CMLOUT_AC: +CMLOUT_AC_P -CMLOUT_AC_N
differential pair CLKout1: +CLKout1_P -CLKout1_N
differential pair CLKout1_C: +CLKout1_C_P -CLKout1_C_N
differential pair CLKin1: +CLKin1_P -CLKin1_N
differential pair CLKin1P: +CLKin1P_P -CLKin1P_N
differential pair CLKin0: +CLKin0_P -CLKin0_N
differential pair CLKin0P: +CLKin0P_P -CLKin0P_N
differential pair AIn_2122B: +AIn_2122B_P -AIn_2122B_N
differential pair Ain_2122A: +AIn_2122A_P -Ain_2122A_N
differential pair AIn_2122_B: +AIn_2122_B_P -AIn_2122_B_N
differential pair Ain_2122_A: +AIn_2122_A_P -Ain_2122_A_N

## Components (designator, comment, footprint, x,y, rotation, side; value= is the part's Value field where it differs from the comment)
C1 "4.7uF" "CAP 0603/1608 RF" 3.175,15.538 r0 top
C2 "4.7uF" "CAP 0603/1608 RF" 15.558,20.875 r270 top
C3 "1uF" "CAP 0603/1608 RF" 2.55,32.462 r270 top
C4 "2.2uF" "CAP 0402/1005 RF KK" 24.9,47.75 r0 top
C5 "100pF" "CAP 0402/1005 RF KK" 6.267,35.524 r180 top
C6 "1uF" "CAP 0402/1005 RF KK" 11.815,25.299 r0 top
C7 "1uF" "CAP 0402/1005 RF KK" 9.626,29.282 r180 top
C8 "4.7uF" "CAP 0402/1005 RF KK" 8.151,29.62 r270 top
C9 "4.7uF" "CAP 0402/1005 RF KK" 7.134,29.62 r270 top
C10 "1uF" "CAP 0402/1005 RF KK" 18.491,37.154 r0 top
C11 "1uF" "CAP 0402/1005 RF KK" 26.152,64.966 r90 top
C12 "4.7uF" "CAP 0402/1005 RF KK" 26.542,66.306 r180 top
C13 "4.7uF" "CAP 0402/1005 RF KK" 26.542,67.381 r180 top
C14 "100nF" "CAP 0201/0603 KK" 34.625,9.319 r270 top
C15 "100nF" "CAP 0201/0603 KK" 33.067,11.319 r180 top
C35 "10uF" "CAP 0402/1005 RF KK" 52.861,14.519 r90 bottom
C36 "10uF" "CAP 0402/1005 RF KK" 58.326,26.547 r270 bottom
C37 "10uF" "CAP 0402/1005 RF KK" 55.918,25.232 r270 bottom
C38 "4.7uF" "CAP 0603/1608 RF" 59.894,50.14 r0 top
C39 "100nF" "CAP 0201/0603 KK" 53.333,35.536 r180 top
C40 "100nF" "CAP 0201/0603 KK" 53.61,40.955 r90 top
C41 "100nF" "CAP 0201/0603 KK" 53.632,36.613 r90 top
C42 "100pF" "CAP 0402/1005 RF KK" 54.574,50.14 r0 top
C43 "100nF" "CAP 0201/0603 KK" 54.323,40.955 r90 top
C44 "100nF" "CAP 0201/0603 KK" 54.271,36.613 r90 top
C45 "100nF" "CAP 0201/0603 KK" 54.573,35.536 r180 top
C46 "100nF" "CAP 0201/0603 KK" 58.847,14.205 r270 bottom
C47 "100nF" "CAP 0201/0603 KK" 59.538,14.205 r270 bottom
C48 "100nF" "CAP 0402/1005 RF KK" 14.176,58.109 r90 bottom
C49 "68nF" "CAP 0402/1005 RF KK" 30.654,58.109 r90 bottom
C50 "100nF" "CAP 0201/0603 KK" 63.364,19.559 r180 bottom
C51 "100nF" "CAP 0201/0603 KK" 63.364,18.839 r180 bottom
C52 "100nF" "CAP 0201/0603 KK" 44.806,28.326 r0 bottom
C53 "100nF" "CAP 0201/0603 KK" 44.806,29.046 r0 bottom
C54 "100nF" "CAP 0201/0603 KK" 61.063,14.259 r270 bottom
C55 "100nF" "CAP 0201/0603 KK" 44.806,30.567 r0 bottom
C56 "100nF" "CAP 0201/0603 KK" 44.806,29.847 r0 bottom
C57 "100nF" "CAP 0201/0603 KK" 62.747,32.964 r180 top
C58 "100nF" "CAP 0201/0603 KK" 62.744,32.272 r180 top
C59 "100nF" "CAP 0201/0603 KK" 60.323,14.259 r270 bottom
C60 "1nF" "CAP 0201/0603 KK" 40.46,7.474 r270 bottom
C61 "1nF" "CAP 0201/0603 KK" 41.12,7.474 r270 bottom
C62 "100nF" "CAP 0201/0603 KK" 38.053,38.2 r0 bottom
C63 "1nF" "CAP 0201/0603 KK" 38.066,7.474 r270 bottom
C64 "1nF" "CAP 0201/0603 KK" 38.727,7.474 r270 bottom
C65 "2.2uF" "CAP 0402/1005 RF KK" 38.743,35.004 r0 bottom
C66 "100nF" "CAP 0201/0603 KK" 39.497,38.196 r180 bottom
C67 "1uF" "CAP 0402/1005 RF KK" 23.285,28.876 r0 top
C68 "1uF" "CAP 0402/1005 RF KK" 5.576,50.764 r90 top
C70 "100nF" "CAP 0201/0603 KK" 40.287,9.39 r270 top
C71 "100nF" "CAP 0201/0603 KK" 40.84,12.524 r90 top
C73 "2.2uF" "CAP 0402/1005 RF KK" 36.863,34.288 r0 top
C74 "2.2uF" "CAP 0402/1005 RF KK" 39.449,34.395 r270 top
C75 "4.7uF" "CAP 0603/1608 RF" 27.203,17.196 r90 top
C76 "4.7uF" "CAP 0603/1608 RF" 42.997,33.486 r180 top
C77 "100nF" "CAP 0201/0603 KK" 41.367,33.588 r270 top
C78 "100nF" "CAP 0201/0603 KK" 43.341,31.448 r180 top
C79 "100nF" "CAP 0201/0603 KK" 33.759,32.303 r0 top
C80 "100nF" "CAP 0201/0603 KK" 43.572,25.723 r180 top
C81 "100nF" "CAP 0201/0603 KK" 33.869,25.723 r0 top
C82 "100nF" "CAP 0201/0603 KK" 35.284,33.642 r270 top
C83 "100nF" "CAP 0201/0603 KK" 33.869,26.442 r0 top
C84 "100nF" "CAP 0201/0603 KK" 33.754,31.442 r0 top
C85 "100nF" "CAP 0201/0603 KK" 43.572,26.442 r180 top
C86 "10uF" "CAP 0603/1608 RF" 33.274,24.663 r0 top
C87 "10uF" "CAP 0603/1608 RF" 33.705,34.053 r270 top
C88 "100nF" "CAP 0201/0603 KK" 41.492,23.877 r90 top
C89 "100nF" "CAP 0201/0603 KK" 40.779,23.877 r90 top
C90 "100nF" "CAP 0201/0603 KK" 35.677,23.877 r90 top
C91 "4.7uF" "CAP 0603/1608 RF" 18.376,16.459 r90 top
C92 "1nF" "CAP 0201/0603 KK" 22.323,13.023 r180 top
C93 "100nF" "CAP 0201/0603 KK" 60.462,26.707 r90 top
C94 "100nF" "CAP 0201/0603 KK" 58.262,26.681 r90 top
C95 "100nF" "CAP 0201/0603 KK" 59.454,24.508 r180 top
C96 "10uF" "CAP 0402/1005 RF KK" 58.285,25.073 r270 top
C97 "100nF" "CAP 0201/0603 KK" 54.755,10.461 r180 top
C98 "100nF" "CAP 0201/0603 KK" 53.978,11.734 r270 top
C99 "100nF" "CAP 0201/0603 KK" 53.978,12.934 r90 top
C100 "10uF" "CAP 0402/1005 RF KK" 55.032,14.012 r180 top
C101 "100nF" "CAP 0201/0603 KK" 57.398,26.689 r90 top
C102 "100nF" "CAP 0201/0603 KK" 55.119,26.689 r90 top
C103 "100nF" "CAP 0201/0603 KK" 56.037,24.504 r0 top
C104 "10uF" "CAP 0402/1005 RF KK" 57.383,25.078 r270 top
C105 "100nF" "CAP 0201/0603 KK" 52.273,26.681 r90 top
C106 "100nF" "CAP 0201/0603 KK" 54.42,26.681 r90 top
C107 "100nF" "CAP 0201/0603 KK" 53.222,24.493 r0 top
C108 "10uF" "CAP 0402/1005 RF KK" 54.754,25.078 r270 top
C109 "100nF" "CAP 0201/0603 KK" 59.538,38.01 r180 top
C110 "100nF" "CAP 0201/0603 KK" 59.538,38.836 r180 top
C111 "100nF" "CAP 0201/0603 KK" 58.063,41.239 r180 top
C112 "10uF" "CAP 0402/1005 RF KK" 58.063,42.044 r180 top
C113 "100nF" "CAP 0201/0603 KK" 60.802,11.739 r270 top
C114 "100nF" "CAP 0201/0603 KK" 59.777,10.557 r0 top
C115 "100nF" "CAP 0201/0603 KK" 59.517,13.95 r0 top
C116 "10uF" "CAP 0402/1005 RF KK" 60.962,13.39 r90 top
C117 "100nF" "CAP 0201/0603 KK" 49.747,14.414 r180 top
C118 "100nF" "CAP 0201/0603 KK" 49.099,15.576 r270 top
C119 "100nF" "CAP 0201/0603 KK" 52.634,15.576 r90 top
C120 "10uF" "CAP 0402/1005 RF KK" 51.194,14.414 r0 top
C121 "100nF" "CAP 0201/0603 KK" 65.435,21.145 r0 top
C122 "100nF" "CAP 0201/0603 KK" 66.24,20.009 r90 top
C123 "100nF" "CAP 0201/0603 KK" 62.884,19.7 r90 top
C124 "10uF" "CAP 0402/1005 RF KK" 64.065,21.145 r180 top
C125 "100nF" "CAP 0201/0603 KK" 49.14,17.536 r90 top
C126 "100nF" "CAP 0201/0603 KK" 49.999,18.718 r180 top
C127 "100nF" "CAP 0201/0603 KK" 52.576,17.536 r90 top
C128 "10uF" "CAP 0402/1005 RF KK" 51.383,18.718 r0 top
C129 "10uF" "CAP 0603/1608 RF" 26.892,38.275 r270 top
C130 "10nF" "CAP 0201/0603 KK" 25.42,36.925 r0 top
C131 "100nF" "CAP 0201/0603 KK" 65.749,16.751 r0 top
C132 "100nF" "CAP 0201/0603 KK" 66.373,17.977 r270 top
C133 "100nF" "CAP 0201/0603 KK" 62.884,17.954 r90 top
C134 "10uF" "CAP 0402/1005 RF KK" 64.219,16.751 r180 top
C135 "100nF" "CAP 0201/0603 KK" 49.112,20.009 r90 top
C136 "100nF" "CAP 0201/0603 KK" 49.914,21.323 r180 top
C137 "100nF" "CAP 0201/0603 KK" 52.576,20.009 r90 top
C138 "10uF" "CAP 0402/1005 RF KK" 51.388,21.323 r0 top
C139 "10uF" "CAP 0805/2012 RF" 18.711,33.282 r0 top
C140 "10uF" "CAP 0805/2012 RF" 18.711,35.427 r0 top
C141 "10uF" "CAP 0603/1608 RF" 26.788,30.44 r90 top
C142 "10nF" "CAP 0201/0603 KK" 25.346,31.596 r0 top
C143 "100nF" "CAP 0201/0603 KK" 66.457,15.113 r270 top
C144 "100nF" "CAP 0201/0603 KK" 65.799,13.993 r0 top
C145 "100nF" "CAP 0201/0603 KK" 62.911,15.324 r270 top
C146 "10uF" "CAP 0402/1005 RF KK" 64.247,13.824 r180 top
C147 "100nF" "CAP 0201/0603 KK" 57.909,11.485 r270 top
C148 "100nF" "CAP 0201/0603 KK" 56.684,10.769 r0 top
C149 "100nF" "CAP 0201/0603 KK" 56.794,14.273 r0 top
C150 "10uF" "CAP 0402/1005 RF KK" 57.909,13.006 r90 top
C151 "100nF" "CAP 0402/1005 RF KK" 22.816,30.764 r180 top
C152 "100nF" "CAP 0402/1005 RF KK" 22.453,37.475 r0 top
C153 "100nF" "CAP 0201/0603 KK" 17.323,9.367 r270 top
C154 "100nF" "CAP 0201/0603 KK" 14.637,34.231 r180 bottom
C156 "120pF" "CAP 0402/1005 RF KK" 36.567,47.788 r180 bottom
C158 "120pF" "CAP 0402/1005 RF KK" 40.704,47.788 r180 bottom
C159_U_RF_ANT_L "120pF" "CAP 0402/1005 RF KK" 20.13,77.112 r180 bottom (schematic designator C159)
C159_U_RF_ANT_M "120pF" "CAP 0402/1005 RF KK" 53.433,76.393 r180 bottom (schematic designator C159)
C160_U_RF_ANT_L "120pF" "CAP 0402/1005 RF KK" 10.258,74.775 r270 bottom (schematic designator C160)
C160_U_RF_ANT_M "120pF" "CAP 0402/1005 RF KK" 43.552,76.393 r180 bottom (schematic designator C160)
C161 "8.2nF" "CAP 0603/1608 RF" 51.141,60.21 r0 bottom
C162 "8.2nF" "CAP 0603/1608 RF" 48.485,57.322 r180 bottom
C163 "100pF" "CAP 0201/0603 KK" 39.788,59.8 r90 bottom
C164 "120pF" "CAP 0402/1005 RF KK" 42.748,48.365 r270 bottom
C165 "2.2µF" "CAP 0603/1608 RF" 40.589,67.432 r270 bottom
C166 "100nF" "CAP 0201/0603 KK" 41.654,67.073 r270 bottom
C167 "82pF" "CAP 0402/1005 RF KK" 38.098,61.504 r270 bottom
C168 "10pF" "CAP 0402/1005 RF KK" 55.288,61.504 r180 bottom
C169 "100pF" "CAP 0201/0603 KK" 53.043,62.86 r270 bottom
C171 "8.2nF" "CAP 0603/1608 RF" 30.384,49.428 r90 bottom
C172 "8.2nF" "CAP 0603/1608 RF" 32.633,50.469 r180 bottom
C173 "120pF" "CAP 0402/1005 RF KK" 38.498,68.861 r270 bottom
C175 "120pF" "CAP 0402/1005 RF KK" 34.637,48.09 r90 bottom
C176 "2.2µF" "CAP 0603/1608 RF" 10.121,61.346 r270 bottom
C177 "100nF" "CAP 0201/0603 KK" 11.149,60.461 r90 bottom
C178 "120pF" "CAP 0402/1005 RF KK" 12.929,63.915 r270 bottom
C179 "100nF" "CAP 0201/0603 KK" 36.492,23.877 r90 top
C180_U_ATT1 "100nF" "CAP 0201/0603 KK" 9.026,70.54 r90 bottom (schematic designator C180)
C180_U_ATT2 "100nF" "CAP 0201/0603 KK" 36.232,76.434 r270 bottom (schematic designator C180)
C181_U_ATT1 "10uF" "CAP 0402/1005 RF KK" 9.881,70.425 r90 bottom (schematic designator C181)
C181_U_ATT2 "10uF" "CAP 0402/1005 RF KK" 35.365,76.428 r270 bottom (schematic designator C181)
C182_U_ATT1 "330pF" "CAP 0402/1005 RF KK" 14.52,64.313 r0 bottom (schematic designator C182)
C182_U_ATT2 "330pF" "CAP 0402/1005 RF KK" 41.374,69.479 r0 bottom (schematic designator C182)
C183_U_ATT1 "330pF" "CAP 0402/1005 RF KK" 16.894,66.813 r0 bottom (schematic designator C183)
C183_U_ATT2 "330pF" "CAP 0402/1005 RF KK" 42.402,71.801 r0 bottom (schematic designator C183)
C184_U_ATT1 "330pF" "CAP 0402/1005 RF KK" 16.894,67.702 r0 bottom (schematic designator C184)
C184_U_ATT2 "330pF" "CAP 0402/1005 RF KK" 42.402,72.614 r0 bottom (schematic designator C184)
C185_U_ATT1 "330pF" "CAP 0402/1005 RF KK" 16.894,68.591 r0 bottom (schematic designator C185)
C185_U_ATT2 "330pF" "CAP 0402/1005 RF KK" 42.402,73.452 r0 bottom (schematic designator C185)
C186_U_RF_ANT_L "100pF" "CAP 0201/0603 KK" 18.57,76.852 r90 bottom (schematic designator C186)
C186_U_RF_ANT_M "100pF" "CAP 0201/0603 KK" 51.989,76.653 r270 bottom (schematic designator C186)
C187_U_RF_ANT_L "100pF" "CAP 0201/0603 KK" 10.536,73.164 r180 bottom (schematic designator C187)
C187_U_RF_ANT_M "100pF" "CAP 0201/0603 KK" 42.022,76.653 r270 bottom (schematic designator C187)
C188 "100pF" "CAP 0201/0603 KK" 33.592,56.747 r180 bottom
C190 "100pF" "CAP 0201/0603 KK" 17.609,58.759 r270 bottom
C192 "100nF" "CAP 0201/0603 KK" 63.398,17.065 r180 bottom
C193 "100nF" "CAP 0201/0603 KK" 63.398,16.341 r180 bottom
D7_U_RF_ANT_L "MADP-011029-14150T" ODS-1415 14.771,76.712 r180 bottom (schematic designator D7)
D7_U_RF_ANT_M "MADP-011029-14150T" ODS-1415 47.966,75.993 r180 bottom (schematic designator D7)
D8_U_RF_ANT_L "MADL-011021-14150T" ODS-1415 12.427,77.112 r180 bottom (schematic designator D8)
D8_U_RF_ANT_M "MADL-011021-14150T" ODS-1415 45.629,76.393 r180 bottom (schematic designator D8)
D9 "LTST-C190GKT" "LED 0603/1608 GREEN" 16.674,14.594 r90 top
D10 "LTST-C190GKT" "LED 0603/1608 GREEN" 22.93,52.672 r270 top
D11 "LTST-C190GKT" "LED 0603/1608 GREEN" 2.715,9.075 r270 top
D12 "LTST-C190GKT" "LED 0603/1608 GREEN" 8.776,24.439 r270 top
D13 "LTST-C190GKT" "LED 0603/1608 GREEN" 21.482,65.906 r180 top
FB1 "120R" "FER 0603/1608 KK" 8.311,27.846 r180 top
FB2 "120R" "FER 0603/1608 KK" 24.765,66.256 r90 top
FB6 "120R" "FER 0402/1005 KK" 29.701,24.084 r90 top
FB7 "33R" FB1206 32.5,22.585 r0 top
FB8 "220R" "FER 0603/1608 KK" 59.454,26.238 r270 top
FB9 "220R" "FER 0603/1608 KK" 55.049,12.219 r90 top
FB10 "220R" "FER 0603/1608 KK" 56.239,26.238 r270 top
FB11 "220R" "FER 0603/1608 KK" 53.322,26.238 r270 top
FB12 "220R" "FER 0603/1608 KK" 58.054,39.511 r90 top
FB13 "220R" "FER 0603/1608 KK" 59.671,12.24 r90 top
FB14 "220R" "FER 0603/1608 KK" 50.872,15.657 r0 top
FB15 "120R" "FER 0603/1608 KK" 61.233,41.699 r0 top
FB16 "220R" "FER 0603/1608 KK" 64.481,19.928 r180 top
FB17 "220R" "FER 0603/1608 KK" 50.872,17.514 r0 top
FB18 "220R" "FER 0603/1608 KK" 64.599,18.014 r180 top
FB19 "220R" "FER 0603/1608 KK" 50.825,20.009 r0 top
FB20 "220R" "FER 0603/1608 KK" 64.704,15.088 r180 top
FB21 "220R" "FER 0603/1608 KK" 56.684,12.492 r90 top
FB22 "120R" "FER 0402/1005 KK" 8.876,60.346 r90 bottom
FB23 "120R" "FER 0402/1005 KK" 35.741,66.331 r0 top
FB24 "120R" "FER 0402/1005 KK" 8.118,70.54 r90 bottom
FB25 "120R" "FER 0402/1005 KK" 34.108,75.604 r90 bottom
FB26 "120R" "FER 0402/1005 KK" 29.781,47.665 r0 bottom
FB27 "120R" "FER 0402/1005 KK" 48.175,58.715 r0 top
FB30 "120R" "FER 0603/1608 KK" 19,10.536 r0 top
FB31 "120R" "FER 0603/1608 KK" 19,12.167 r0 top
FB32 "120R" "FER 0603/1608 KK" 32.022,45.827 r90 top
FB33 "120R" "FER 0603/1608 KK" 30.384,45.82 r90 top
FB34 "120R" "FER 0603/1608 KK" 28.744,45.82 r90 top
FID1 "Fiducials" Fiducials 2.718,51.892 r0 top
FID2 "Fiducials" Fiducials 35.001,69.494 r0 top
FID3 "Fiducials" Fiducials 49.784,42.52 r0 top
FID4 "Fiducials" Fiducials 55.247,67.525 r0 top
FID5 "Fiducials" Fiducials 31.184,33.136 r0 top
FID6 "Fiducials" Fiducials 51.11,24.625 r0 top
FL1 "SAW TB0787A" TB0787A 45.21,61.33 r0 bottom
FL3 "SAW B3802" QCC12B 22.63,57.229 r0 bottom
H1 "6.5x0.8x1.27mm" 36900000 24.361,39.225 r180 bottom
H2 "6.5x0.8x1.27mm" 36900000 6.943,62.218 r90 bottom
H3 "6.5x0.8x1.27mm" 36900000 35.365,81.585 r180 bottom
H4 "6.5x0.8x1.27mm" 36900000 62.636,60.34 r90 bottom
H5 "6.5x0.8x1.27mm" 36900000 57.994,39.225 r180 bottom
J1 "1909763-1" TECO-1909763-1_V 67.34,51.208 r270 top
J2 "1909763-1" TECO-1909763-1_V 67.34,55.46 r270 top
J3 "1909763-1" TECO-1909763-1_V 67.34,34.77 r0 top
J4 "1909763-1" TECO-1909763-1_V 67.34,30.453 r180 top
J5_U_RF_ANT_L "1909763-1" TECO-1909763-1_V 17.115,73.457 r180 top (schematic designator J5)
J5_U_RF_ANT_M "1909763-1" TECO-1909763-1_V 50.368,72.514 r180 top (schematic designator J5)
J6_U_RF_ANT_L "32K101-400L5" ROS-32K101-400L5_V 25.14,77.15 r180 top (schematic designator J6)
J6_U_RF_ANT_M "32K101-400L5" ROS-32K101-400L5_V 58.164,76.393 r180 top (schematic designator J6)
J7 "1909763-1" TECO-1909763-1_V 16.472,60.009 r270 top
J8 "1909763-1" TECO-1909763-1_V 43.179,65.208 r270 top
J9 "1909763-1" TECO-1909763-1_V 57.119,55.322 r90 bottom
J15 "1909763-1" TECO-1909763-1_V 38.529,50.14 r270 top
L6 "56nH" FB0402 15.861,58.499 r0 bottom
L7 "56nH" FB0402 28.405,58.499 r0 bottom
L8 "270nH, 0.17A" WE-KI_0603 34.003,52.282 r180 bottom
L9 "270nH, 0.17A" WE-KI_0603 52.66,57.254 r180 bottom
L10 "18nH" FB0603 50.88,62.6 r0 bottom
L11 "12nH" FB0603 37.404,63.25 r0 bottom
P1 "PCIeMini-CN-2S-M-R52" PCIeMini-GF-2D-800-1K-S52 35,1.4 r0 top locked
R1 "27kR" "RES 0402/1005 RF KK" 3.497,21.226 r180 top
R2 "11.3kR" "RES 0402/1005 RF KK" 13.562,23.229 r0 top
R3 "1.07kR" "RES 0402/1005 RF KK" 5.828,23.229 r180 top
R4 "3.16kR" "RES 0402/1005 RF KK" 11.278,23.229 r0 top
R5 "10kR" "RES 0402/1005 RF KK" 3.955,22.97 r270 top
R6 "82.5kR" "RES 0402/1005 RF KK" 8.786,26.507 r180 top
R7 "14.7kR" "RES 0402/1005 RF KK" 10.102,24.889 r90 top
R8 "68.1kR" "RES 0402/1005 RF KK" 23.482,65.806 r90 top
R9 "14.7kR" "RES 0402/1005 RF KK" 21.982,64.538 r0 top
R10 "1kR" "RES 0402/1005 RF KK" 16.711,19.539 r270 bottom
R11 "1kR" "RES 0402/1005 RF KK" 18.257,19.539 r270 bottom
R12 "10kR" "RES 0402/1005 RF KK" 43.658,13.929 r90 bottom
R13 "1kR" "RES 0402/1005 RF KK" 28.55,15.836 r180 bottom
R14 "2kR" "RES 0402/1005 RF KK" 30.399,28.832 r180 top
R15 "10kR" "RES 0402/1005 RF KK" 30.331,30.789 r180 top
R16 "0mR" "RES 0402/1005 RF - 3-PADS" 12.532,60.009 r90 bottom
R17 "100R" "RES 0201/0603"#1 35.996,6.902 r180 bottom
R19 "51R" "RES 0402/1005 RF KK" 52.972,37.783 r180 top
R20 "0mR" "RES 0402/1005 RF KK" 57.119,50.14 r180 top
R21 "0mR" "RES 0402/1005 RF KK" 53.493,39.225 r270 top
R22 "0mR" "RES 0402/1005 RF KK" 54.443,39.225 r270 top
R23 "51R" "RES 0402/1005 RF KK" 54.963,37.783 r180 top
R24 "0mR" "RES 0402/1005 RF KK" 62.009,52.882 r180 top
R25 "270R" "RES 0402/1005 RF KK" 63.451,52.405 r90 top
R26 "51R" "RES 0402/1005 RF KK" 60.569,52.405 r90 top
R27 "100R" "RES 0402/1005 RF KK" 59.49,53.339 r270 top
R28 "270R" "RES 0402/1005 RF KK" 63.454,54.29 r90 top
R29 "51R" "RES 0402/1005 RF KK" 60.556,54.29 r90 top
R30 "0mR" "RES 0402/1005 RF KK" 62.009,53.819 r180 top
R31 "0mR" "RES 0402/1005 RF KK" 61.176,10.766 r90 bottom
R32 "270R" "RES 0402/1005 RF KK" 61.63,9.347 r180 bottom
R33 "51R" "RES 0402/1005 RF KK" 61.63,12.189 r180 bottom
R34 "100R" "RES 0402/1005 RF KK" 60.693,13.066 r0 bottom
R35 "0mR" "RES 0402/1005 RF KK" 63.924,22.124 r0 bottom
R36 "0mR" "RES 0402/1005 RF KK" 63.924,21.274 r0 bottom
R37 "270R" "RES 0402/1005 RF KK" 59.76,9.347 r180 bottom
R38 "51R" "RES 0402/1005 RF KK" 59.76,12.189 r180 bottom
R39 "0mR" "RES 0402/1005 RF KK" 60.21,10.766 r90 bottom
R40 "51R" "RES 0402/1005 RF KK" 60.037,33.518 r270 top
R41 "100R" "RES 0402/1005 RF KK" 61.455,32.618 r270 top
R42 "51R" "RES 0402/1005 RF KK" 60.037,31.662 r90 top
R43 "100R" "RES 0201/0603"#1 43.733,28.692 r90 bottom
R44 "100R" "RES 0201/0603"#2 43.729,30.212 r270 bottom
R45 "4.99R" "RES 0402/1005 RF KK" 35.43,37.077 r270 bottom
R46 "45.3R" "RES 0402/1005 RF KK" 34.872,40.186 r0 bottom
R47 "100R" "RES 0402/1005 RF KK" 35.887,35.604 r180 bottom
R48 "45.3R" "RES 0402/1005 RF KK" 36.867,40.186 r0 bottom
R49 "4.99R" "RES 0402/1005 RF KK" 36.342,37.077 r270 bottom
R50 "24.9R" "RES 0402/1005 RF KK" 38.133,36.572 r90 bottom
R51 "4.99R" "RES 0402/1005 RF KK" 41.947,37.216 r270 bottom
R52 "45.3R" "RES 0402/1005 RF KK" 42.48,40.275 r180 bottom
R53 "100R" "RES 0402/1005 RF KK" 41.497,35.771 r0 bottom
R54 "24.9R" "RES 0402/1005 RF KK" 39.329,36.572 r270 bottom
R55 "45.3R" "RES 0402/1005 RF KK" 40.506,40.275 r180 bottom
R56 "4.99R" "RES 0402/1005 RF KK" 41.047,37.216 r270 bottom
R57 "1kR" "RES 0402/1005 RF KK" 14.818,46.677 r90 top
R58 "1kR" "RES 0402/1005 RF KK" 15.707,46.677 r90 top
R59 "1kR" "RES 0402/1005 RF KK" 16.596,46.677 r90 top
R60 "0mR" "RES 0402/1005 RF KK" 14.818,49.632 r270 top
R61 "0mR" "RES 0402/1005 RF KK" 15.707,49.632 r270 top
R62 "0mR" "RES 0402/1005 RF KK" 16.596,49.639 r270 top
R64 "10kR" "RES 0402/1005 RF KK" 47.032,7.858 r0 bottom
R65 "1kR" "RES 0402/1005 RF KK" 24.3,11.519 r270 bottom
R66 "1kR" "RES 0402/1005 RF KK" 25.429,11.519 r270 bottom
R67 "1kR" "RES 0402/1005 RF KK" 18.351,27.442 r270 top
R68 "1kR" "RES 0402/1005 RF KK" 17.162,27.442 r270 top
R69 "1kR" "RES 0402/1005 RF KK" 16.032,27.442 r270 top
R70 "0mR" "RES 0402/1005 RF KK" 31.982,9.991 r90 top
R71 "0mR" "RES 0402/1005 RF KK" 31.025,10.004 r90 top
R72 "0mR" "RES 0402/1005 RF KK" 18.351,24.623 r90 top
R73 "0mR" "RES 0402/1005 RF KK" 17.187,24.623 r90 top
R74 "0mR" "RES 0402/1005 RF KK" 16.032,24.623 r90 top
R75 "0mR" "RES 0402/1005 RF KK" 32.61,17.189 r270 top
R78_U_RF_ANT_L "0mR" "RES 0402/1005 RF - 3-PADS" 17.109,77.112 r0 bottom (schematic designator R78)
R78_U_RF_ANT_M "0mR" "RES 0402/1005 RF - 3-PADS" 50.368,76.393 r0 bottom (schematic designator R78)
R81 "" "RES 0402/1005 RF KK" 40.797,6.163 r180 bottom
R82 "" "RES 0402/1005 RF KK" 38.39,6.163 r180 bottom
R84 "15R" "RES 0603/1608 RF" 50.555,58.02 r90 bottom
R85 "0mR" "RES 0402/1005 RF - 3-PADS" 38.098,65.208 r90 bottom
R87 "1kR" "RES 0402/1005 RF KK" 28.55,16.852 r180 bottom
R96 "1kR" "RES 0402/1005 RF KK" 36.867,33.186 r0 top
R97 "100kR" "RES 0402/1005 RF KK" 19.993,19.791 r270 top
R98 "100kR" "RES 0402/1005 RF KK" 25.942,17.276 r90 top
R99 "38.3kR" "RES 0402/1005 RF KK" 26.475,15.242 r180 top
R100 "3.57kR" "RES 0402/1005 RF KK" 25.246,37.855 r0 top
R101 "1.15kR" "RES 0402/1005 RF KK" 25.295,38.978 r180 top
R102 "1.87kR" "RES 0402/1005 RF KK" 25.146,30.74 r0 top
R103 "1.5kR" "RES 0402/1005 RF KK" 25.146,29.791 r0 top
R104 "20kR" "RES 0402/1005 RF KK" 22.46,38.442 r180 top
R105 "20kR" "RES 0402/1005 RF KK" 21.023,30.764 r90 top
R106 "FCSL110R005FER" FCSL110R005FERCT-ND 10.789,7.09 r90 top
R107 "10kR" "RES 0402/1005 RF KK" 25.879,7.285 r0 top
R108 "0mR" "RES 0402/1005 RF KK" 22.303,7.285 r0 bottom
R109 "0mR" "RES 0402/1005 RF KK" 22.294,6.294 r0 bottom
R110 "1kR" "RES 0402/1005 RF KK" 19.825,7.285 r0 bottom
R111 "1kR" "RES 0402/1005 RF KK" 19.83,6.294 r0 bottom
R112 "10kR" "RES 0402/1005 RF KK" 16.161,35.33 r270 bottom
R113 "10kR" "RES 0402/1005 RF KK" 11.327,33.977 r0 bottom
R114 "0mR" "RES 0402/1005 RF KK" 7.728,38.381 r270 bottom
R115 "0mR" "RES 0402/1005 RF KK" 16.611,36.872 r180 bottom
R116 "0mR" "RES 0402/1005 RF - 3-PADS" 34.636,50.14 r90 bottom
R119 "0mR" "RES 0402/1005 RF - 3-PADS" 53.298,55.322 r90 bottom
R120 "150R" "RES 0402/1005 RF KK" 15.074,14.768 r90 top
R121 "1kR" "RES 0402/1005 RF KK" 3.161,11.386 r0 top
R122 "330R" "RES 0402/1005 RF KK" 24.857,53.422 r0 top
R123 "1kR" "RES 0402/1005 RF KK" 13.329,27.952 r270 top
R124 "150R" "RES 0402/1005 RF KK" 7.339,25.975 r90 top
R125 "150R" "RES 0402/1005 RF KK" 22.99,67.291 r0 top
R126 "15R" "RES 0603/1608 RF" 32.633,48.78 r180 bottom
T1 "MABA-007159-000000" MABA-007159-000000 35.887,44.144 r90 bottom
T2 "MABA-007159-000000" MABA-007159-000000 41.498,44.158 r90 bottom
U1 "4-18Vin, 3Aout" LGA-16EP 9.485,17.794 r0 top
U2 "AP2210K-5.0TRG1" AP2210K-3.3TRG1 4.938,32.958 r90 top
U3 "ADP125ACPZ-R7" ADP124_125 11.216,27.257 r0 top
U4 "ADP125ACPZ-R7" ADP124_125 24.234,63.463 r270 top
U5 "LMK04610RTQR" LMK04610 57.693,19.206 r270 bottom locked
U6 "LTC2122IUK#PBF" LTC2122 38.617,28.692 r270 bottom locked
U7 "MCP23017T-E/ML" MCP23017/MCP23S17 9.967,52.277 r0 top
U8 "MCP23017T-E/ML" MCP23017/MCP23S17 24.31,24.929 r270 top locked
U9 "PCA9306DQER" PCA9306 22.179,12.956 r180 bottom
U10 "SN74AXC4T774RSVR" 16-UGFN 42.295,10.579 r90 top
U11 "SN74AXC4T774RSVR" 16-UGFN 36.7,10.579 r90 top
U14 "ADP1741ACPZ-R7" ADI-CP-16-13_M 22.373,16.359 r0 top
U15 "TPS7A8801RTJT" TPS7A88 23.445,34.279 r0 top
U16 "INA226AIDGSR" INA226 21.027,7.594 r180 top
U17 "AT24CM02-SSHM-T" AT24CM02 11.937,37.279 r0 bottom
U18 "BGA616" INF-SOT343_V 54.098,59.69 r180 bottom
U19 "BGA729N6" TSNP-6-10-FP 38.498,67.131 r90 bottom
U20 "BGA616" INF-SOT343_V 33.983,54.622 r270 bottom
U21 "BGA729N6" TSNP-6-10-FP 12.929,62.209 r90 bottom
U22_U_ATT1 "HMC472ALP4E" HMC472ALP4E 12.676,67.581 r270 bottom (schematic designator U22)
U22_U_ATT2 "HMC472ALP4E" HMC472ALP4E 38.248,72.614 r270 bottom (schematic designator U22)
U23 "TXB0304RSVR" TXB0304 35.477,18.364 r90 top
X1 "VG-4513CA122.8800M-GFCT3" VG-4513CA 55.233,45.929 r270 top

## Footprints (in the part's own frame and the unit in brackets; to place one, negate y for a bottom-side part, rotate by r counter-clockwise, add the part's x,y. Pads: shape width x height; smd on the part's side, far side on the other; paste and mask are expansions set on the pad)
16-UGFN [mm] "QFN, 16-Leads, Body 1,80x2,60mm, Pitch 0,40mm, IPC High Density"
  rect 0.7x0.2 smd mask+0.052: 1(-0.75,0.6)
  rect 0.6x0.2 smd mask+0.052: 2(-0.8,0.2) 3(-0.8,-0.2) 4(-0.8,-0.6) 9(0.8,-0.6) 10(0.8,-0.2) 11(0.8,0.2) 12(0.8,0.6)
  rect 0.2x0.6 smd mask+0.052: 5(-0.6,-1.2) 6(-0.2,-1.2) 7(0.2,-1.2) 8(0.6,-1.2) 13(0.6,1.2) 14(0.2,1.2) 15(-0.2,1.2) 16(-0.6,1.2)
  silkscreen extent -1.27,1.58 -1.18,1.67, body extent -0.97,-1.38 0.97,1.38, height 0.55
36900000 [mm] "Shielding Cabinet Clip"
  rect 0.6x0.9 smd: 1(-3.05,0) 1(3.05,0)
  rect 1.5x0.9 smd: 1(-1.65,0) 1(1.65,0)
  rect 1.2x0.9 smd: 1(0,0)
  body extent -3.25,-0.41 3.25,0.41, height 1.28
ADI-CP-16-13_M [mm] "QFN, 16-Leads, Body 4x4mm, Pitch 0.65mm, Thermal Pad 2.5x2.5mm, IPC Low Density"
  oval 0.8x0.25 smd: 1(-2.05,0.975) 2(-2.05,0.325) 3(-2.05,-0.325) 4(-2.05,-0.975) 9(2.05,-0.975) 10(2.05,-0.325) 11(2.05,0.325) 12(2.05,0.975)
  oval 0.25x0.8 smd: 5(-0.975,-2.05) 6(-0.325,-2.05) 7(0.325,-2.05) 8(0.975,-2.05) 13(0.975,2.05) 14(0.325,2.05) 15(-0.325,2.05) 16(-0.975,2.05)
  rect 2.5x2.5 smd: 17(0,0)
  silkscreen extent -2.92,-2.15 2.15,2.15, body extent -2,-2 2,2, height 1
ADP124_125 [mm] "8-Lead Lead Frame Chip Scale Package [LFCSP_UD]  2 mm × 2 mm Body, Ultra Thin, Dual Lead  (CP-8-10)"
  rect 0.35x0.25 smd: 1(-0.9,0.75) 2(-0.9,0.25) 3(-0.9,-0.25) 4(-0.9,-0.75) 5(0.9,-0.75) 6(0.9,-0.25) 7(0.9,0.25) 8(0.9,0.75)
  rect 1x1.6 smd: 9(0,0)
  silkscreen extent -1.5,-1.2 1.05,1.25, body extent -1.15,-1.05 1.15,1.05, height 0.55
AP2210K-3.3TRG1 [mm] "SOT23, 5-Leads, Body 2.96x2.83mm, Pitch 0.95mm, IPC High Density"
  rect 1x0.7 smd: 1(-1.3,0.95) 2(-1.3,0) 3(-1.3,-0.95) 4(1.3,-0.95) 5(1.3,0.95)
  silkscreen extent -1.42,-1.55 0.45,1.97, body extent -1.5,-1.55 1.5,1.55, height 1.45
AT24CM02 [mm]
  rect 1.55x0.6 smd: 1(-2.7,1.905) 2(-2.7,0.635) 3(-2.7,-0.635) 4(-2.7,-1.905) 5(2.7,-1.905) 6(2.7,-0.635) 7(2.7,0.635) 8(2.7,1.905)
  silkscreen extent -2.82,-2.2 1.92,2.88, body extent -3,-2.45 3,2.45, height 1.75
"CAP 0201/0603 KK" [mm] "Chip Capacitor, 2-Leads, Body 0.60x0.30mm, IPC High Density"
  rect 0.3x0.32 smd mask+0.062: 1(-0.26,0) 2(0.26,0)
  silkscreen extent -0.58,-0.33 0.58,0.33, body extent -0.3,-0.15 0.3,0.15, height 0.3
"CAP 0402/1005 RF KK" [mm] "Chip Capacitor, 2-Leads, Body 1.02x0.51mm, IPC High Density"
  rect 0.55x0.65 smd: 1(-0.525,0) 2(0.525,0)
  silkscreen extent -0.87,-0.45 0.87,0.45, body extent -0.5,-0.26 0.5,0.26, height 0.52
"CAP 0603/1608 RF" [mm] "Chip Capacitor, 2-Leads, Body 1.60x0.80mm, IPC High Density"
  rect 0.8x0.9 smd: 1(-0.625,0) 2(0.625,0)
  silkscreen extent -1.2,-0.63 1.2,0.63, body extent -0.8,-0.41 0.8,0.41, height 0.82
"CAP 0805/2012 RF" [mm] "Chip Capacitor, 2-Leads, Body 2.00x1.20mm, IPC High Density"
  rect 1.1x1.3 smd: 1(-0.7,0) 2(0.7,0)
  silkscreen extent -1.43,-0.82 1.43,0.82, body extent -1,-0.64 1,0.64, height 1.26
FB0402 [mm] "Chip Inductor, 2-Leads, Body 1,00x0,50mm, IPC High Density"
  rect 0.5x0.5 smd: 1(-0.4,0) 2(0.4,0)
  body extent -0.5,-0.25 0.5,0.25, height 0.6
FB0603 [mm] "Chip Inductor, 2-Leads, Body 1,60x0,80mm, IPC High Density"
  rect 0.6x0.85 smd: 1(-0.7,0) 2(0.7,0)
  silkscreen extent -0.05,-0.3 0.05,0.3, body extent -0.8,-0.4 0.8,0.4, height 0.8
FB1206 [mm] "Chip Inductor, 2-Leads, Body 3,20x1,60mm, IPC High Density"
  rect 0.95x1.64 smd: 1(-1.25,0) 2(1.25,0)
  silkscreen extent -0.5,-0.72 0.5,0.72, body extent -1.6,-0.8 1.6,0.8, height 1.1
FCSL110R005FERCT-ND [mm] "Wide 4320 (11050 Metric), 2043"
  rect 1.05x11.2 smd: 1(-2.3,0) 2(2.3,0)
  silkscreen extent -1.4,-5.5 1.4,5.5, body extent -2.8,-5.6 2.8,5.6, height 0.8
"FER 0402/1005 KK" [mm] "Chip Ferrite, 2-Leads, Body 1.02x0.51mm, IPC Medium Density"
  rect 0.6x0.64 smd: 1(-0.44,0) 2(0.44,0)
  silkscreen extent -1,-0.5 1,0.5, body extent -0.5,-0.26 0.5,0.26, height 0.52
"FER 0603/1608 KK" [mm] "Chip Ferrite, 2-Leads, Body 1.60x0.80mm, IPC Medium Density"
  rect 0.9x1 smd: 1(-0.675,0) 2(0.675,0)
  silkscreen extent -1.4,-0.7 1.4,0.7, body extent -0.8,-0.41 0.8,0.41, height 0.82
Fiducials [mm]
  round 1 smd paste-10 mask+0.5: 0(0,0)
  round 1 smd far side paste-10 mask+0.5: 0(0,0)
  KeepOutLayer circle w0.01: c0,0 r1
HMC472ALP4E [mm] "HMC472ALP4E, QFN, 24-Leads, Body 4,00x4,00mm, Pitch 0,50mm, Thermal Pad 2,80x2,80mm, IPC Medium Density"
  oval 0.8x0.3 smd: 1(-2,1.25) 2(-2,0.75) 3(-2,0.25) 4(-2,-0.25) 5(-2,-0.75) 6(-2,-1.25) 13(2,-1.25) 14(2,-0.75) 15(2,-0.25) 16(2,0.25) 17(2,0.75) 18(2,1.25)
  oval 0.3x0.8 smd: 7(-1.25,-2) 8(-0.75,-2) 9(-0.25,-2) 10(0.25,-2) 11(0.75,-2) 12(1.25,-2) 19(1.25,2) 20(0.75,2) 21(0.25,2) 22(-0.25,2) 23(-0.75,2) 24(-1.25,2)
  rect 2.8x2.8 smd: 25(0,0)
  silkscreen extent -2.82,-2.05 2.05,2.05, body extent -2.05,-2.05 2.05,2.05, height 1
INA226 [mm] "TSSOP, 10-Leads, Body 3,00x3,00mm, Pitch 0,50mm, IPC Medium Density"
  rect 1.45x0.3 smd: 1(-2.2,1) 2(-2.2,0.5) 3(-2.2,0) 4(-2.2,-0.5) 5(-2.2,-1) 6(2.2,-1) 7(2.2,-0.5) 8(2.2,0) 9(2.2,0.5) 10(2.2,1)
  silkscreen extent -2.33,-1.55 1.15,1.82, body extent -2.45,-1.55 2.45,1.55, height 1.1
INF-SOT343_V [mm] "SOT343, 4-Leads, Body 2x1.25 mm"
  rect 0.8x0.6 smd: 1(-0.8,0.65) 3(0.8,-0.65) 4(0.8,0.65)
  rect 0.8x0.9 smd: 2(-0.8,-0.5)
  silkscreen extent -0.85,1.3 -0.75,1.4, body extent -0.63,-1 0.63,1, height 1
"LED 0603/1608 GREEN" [mm] "Chip Diode, 2-Leads, Body 1.60x0.80mm, IPC Medium Density"
  rect 0.8x0.8 smd: 1(-0.75,0) 2(0.75,0)
  silkscreen extent -1.52,-0.7 1.52,0.7, body extent -0.8,-0.4 0.8,0.4, height 0.53
LGA-16EP [mm] "Variable Step Down Regulator Module, LGA-16EP, body 9x9mm"
  rect 1.2x0.9 smd paste-0.025: 1(-3.8,2.25) 2(-3.8,0.75) 3(-3.8,-0.75) 4(-3.8,-2.25) 9(3.8,-2.25) 10(3.8,-0.75) 11(3.8,0.75) 12(3.8,2.25)
  rect 0.9x1.2 smd paste-0.025: 5(-2.25,-3.8) 6(-0.75,-3.8) 7(0.75,-3.8) 8(2.25,-3.8) 13(2.25,3.8) 14(0.75,3.8) 15(-0.75,3.8) 16(-2.25,3.8)
  rect 1.85x1.85 smd paste-0.1: EP(-1.575,-1.575) EP(-1.575,1.575) EP(1.575,-1.575) EP(1.575,1.575)
  silkscreen extent -4.5,-4.5 4.5,4.5, body extent -4.5,-4.5 4.5,4.5, height 3
LMK04610 [mm] "PQFN, 56-Leads, Body 8,00x8,00mm, Pitch 0,50mm, Thermal Pad 5,70x5,70mm, IPC High Density"
  rect 0.6x0.24 smd: 1(-3.9,3.25) 2(-3.9,2.75) 3(-3.9,2.25) 4(-3.9,1.75) 5(-3.9,1.25) 6(-3.9,0.75) 7(-3.9,0.25) 8(-3.9,-0.25) 9(-3.9,-0.75) 10(-3.9,-1.25) 11(-3.9,-1.75) 12(-3.9,-2.25) 13(-3.9,-2.75) 14(-3.9,-3.25) 29(3.9,-3.25) 30(3.9,-2.75) 31(3.9,-2.25) 32(3.9,-1.75) 33(3.9,-1.25) 34(3.9,-0.75) 35(3.9,-0.25) 36(3.9,0.25) 37(3.9,0.75) 38(3.9,1.25) 39(3.9,1.75) 40(3.9,2.25) 41(3.9,2.75) 42(3.9,3.25)
  rect 0.24x0.6 smd: 15(-3.25,-3.9) 16(-2.75,-3.9) 17(-2.25,-3.9) 18(-1.75,-3.9) 19(-1.25,-3.9) 20(-0.75,-3.9) 21(-0.25,-3.9) 22(0.25,-3.9) 23(0.75,-3.9) 24(1.25,-3.9) 25(1.75,-3.9) 26(2.25,-3.9) 27(2.75,-3.9) 28(3.25,-3.9) 43(3.25,3.9) 44(2.75,3.9) 45(2.25,3.9) 46(1.75,3.9) 47(1.25,3.9) 48(0.75,3.9) 49(0.25,3.9) 50(-0.25,3.9) 51(-0.75,3.9) 52(-1.25,3.9) 53(-1.75,3.9) 54(-2.25,3.9) 55(-2.75,3.9) 56(-3.25,3.9)
  rect 5.7x5.7 smd paste-2.85 mask+0.102: 57(0,0)
  rect 1.15x1.15 on Bottom Paste: ""(-2.025,-2.025) ""(-2.025,-0.675) ""(-2.025,0.675) ""(-2.025,2.025) ""(-0.675,-2.025) ""(-0.675,-0.675) ""(-0.675,0.675) ""(-0.675,2.025) ""(0.675,-2.025) ""(0.675,-0.675) ""(0.675,0.675) ""(0.675,2.025) ""(2.025,-2.025) ""(2.025,-0.675) ""(2.025,0.675) ""(2.025,2.025)
  silkscreen extent -4.85,-4.08 4.08,4.08, body extent -4.08,-4.08 4.08,4.08, height 1